# Altium PCB old(2).PcbDoc (part 1 of 4)
Units mil, origin at the board's own origin, x right, y up, seen from the top; angles counter-clockwise.
Board outline 5000 x 7000 mil, 4 copper layers (Top Layer, Signal Layer 1, Signal Layer 2, Bottom Layer), stack 61.2 mil thick; 559 components, 281 nets, 1477 pads, 685 vias.
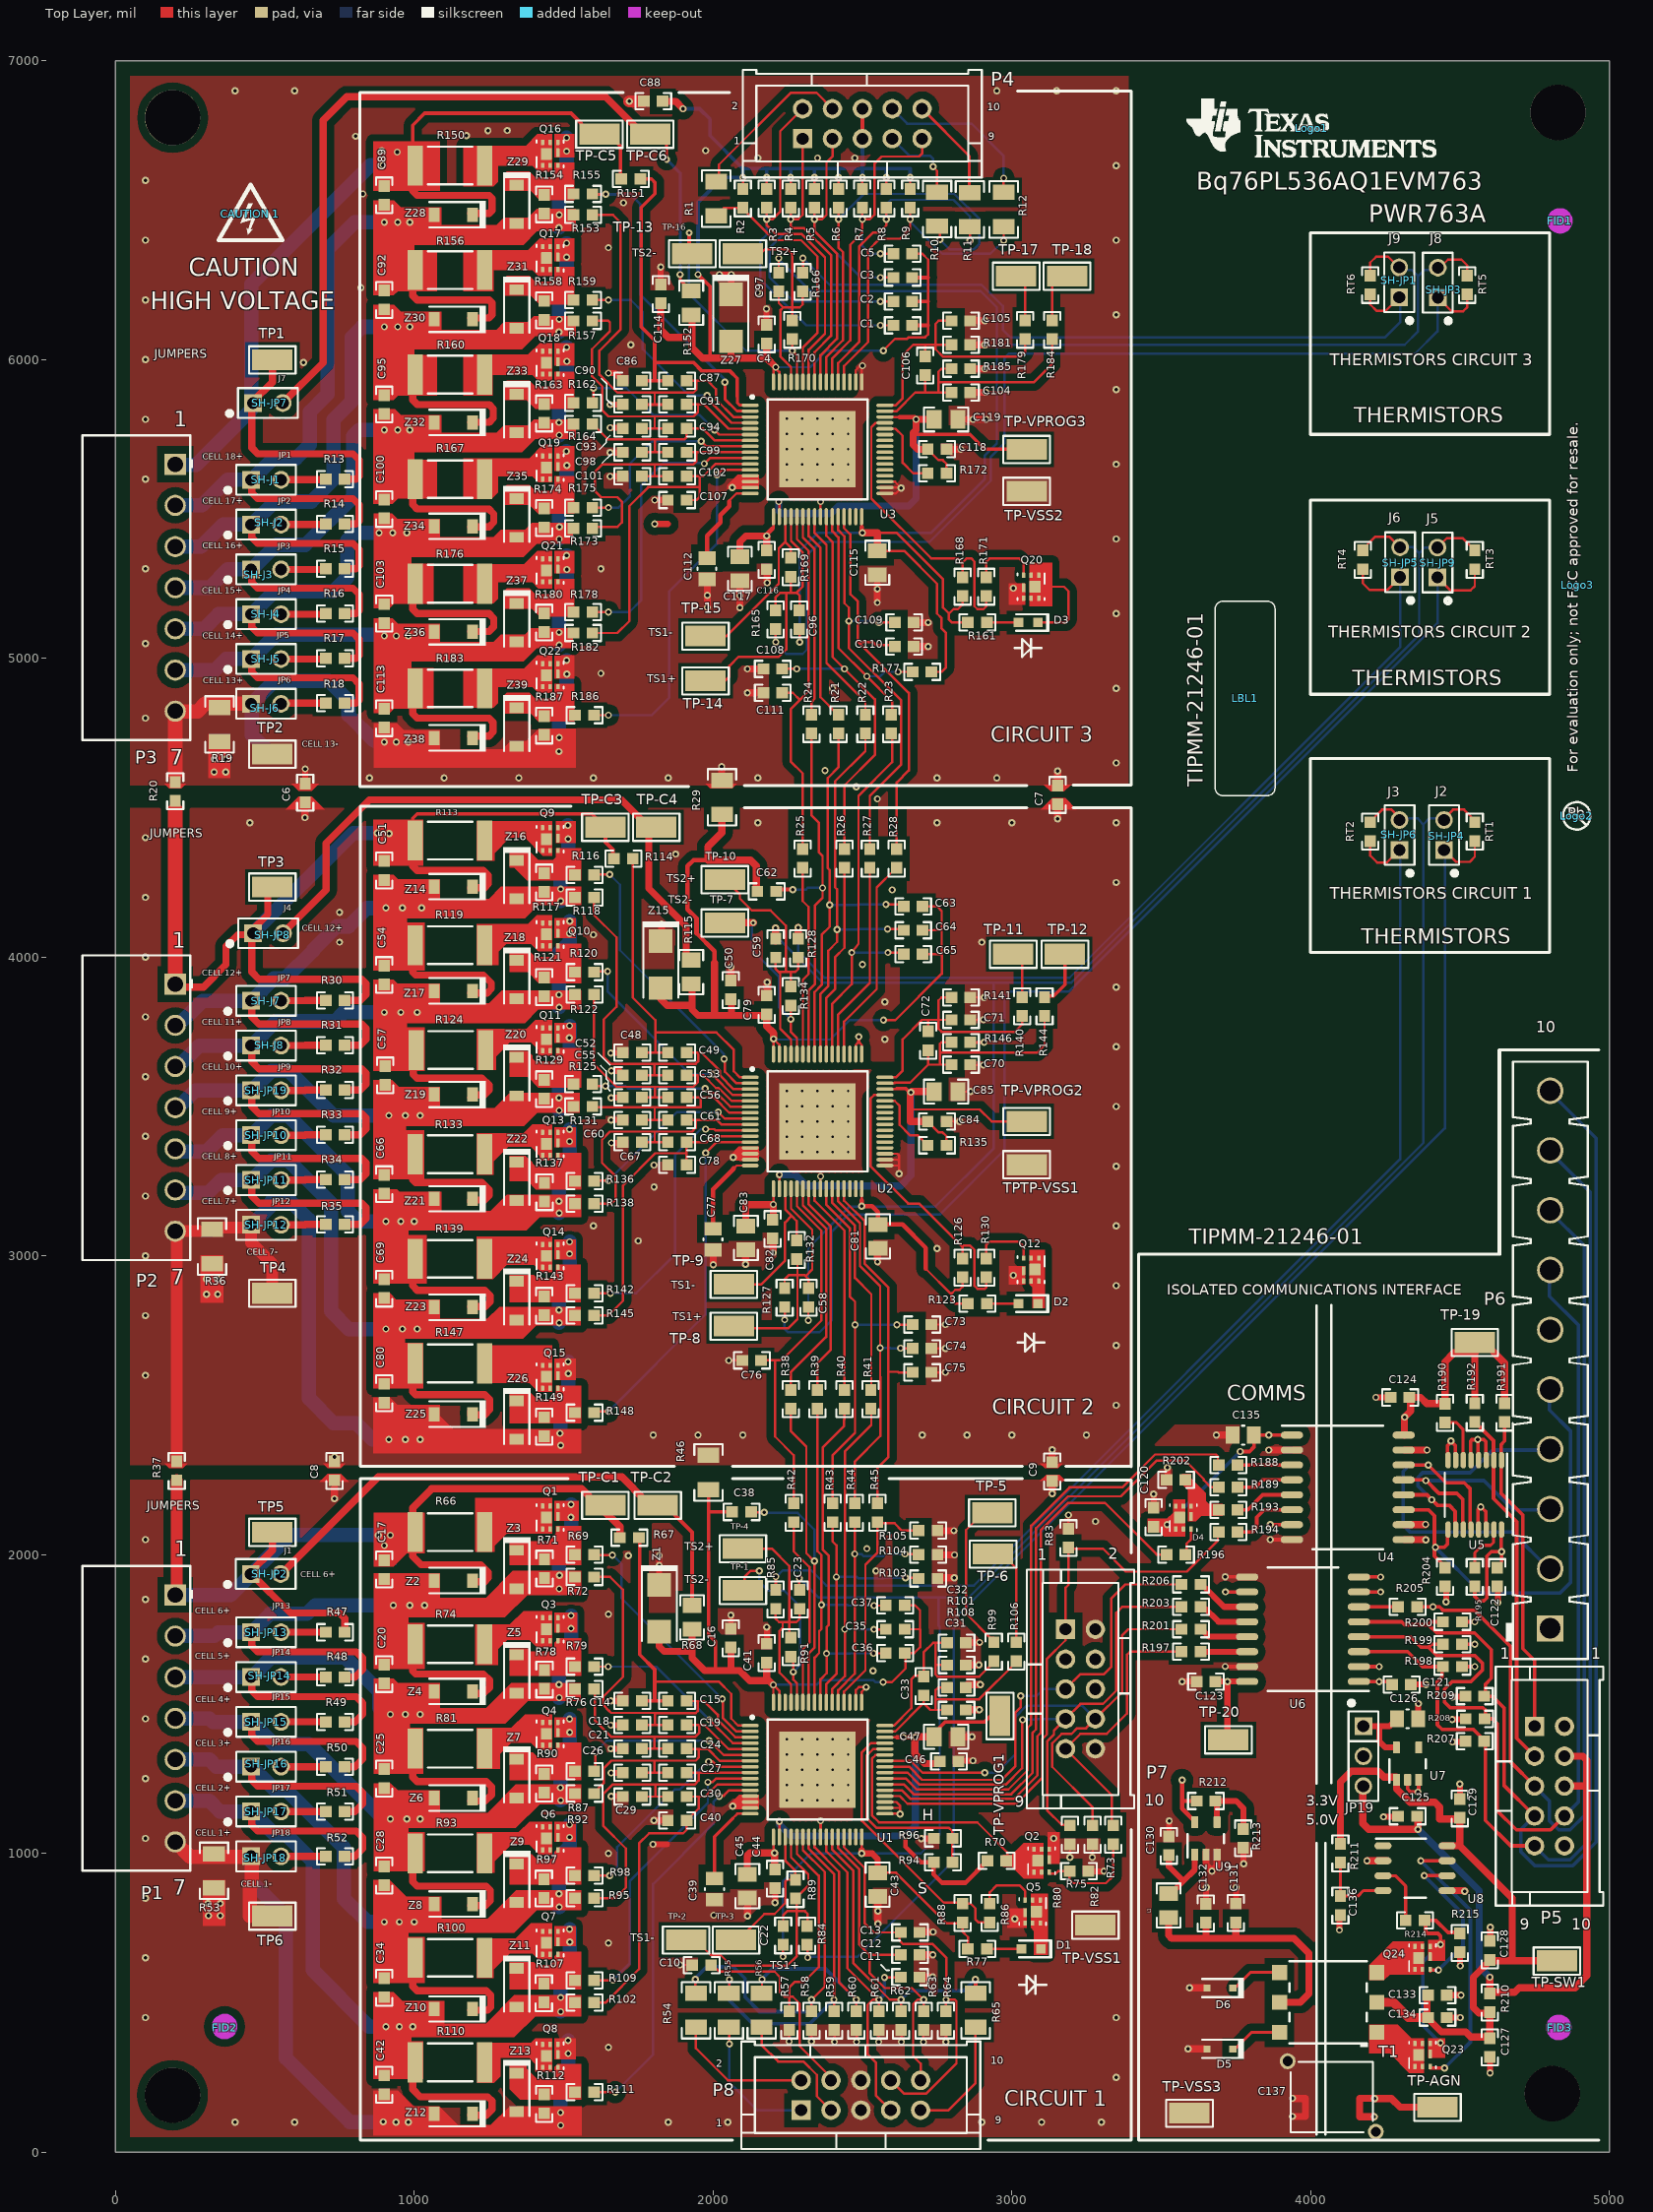
[diagram p0: Top Layer view]
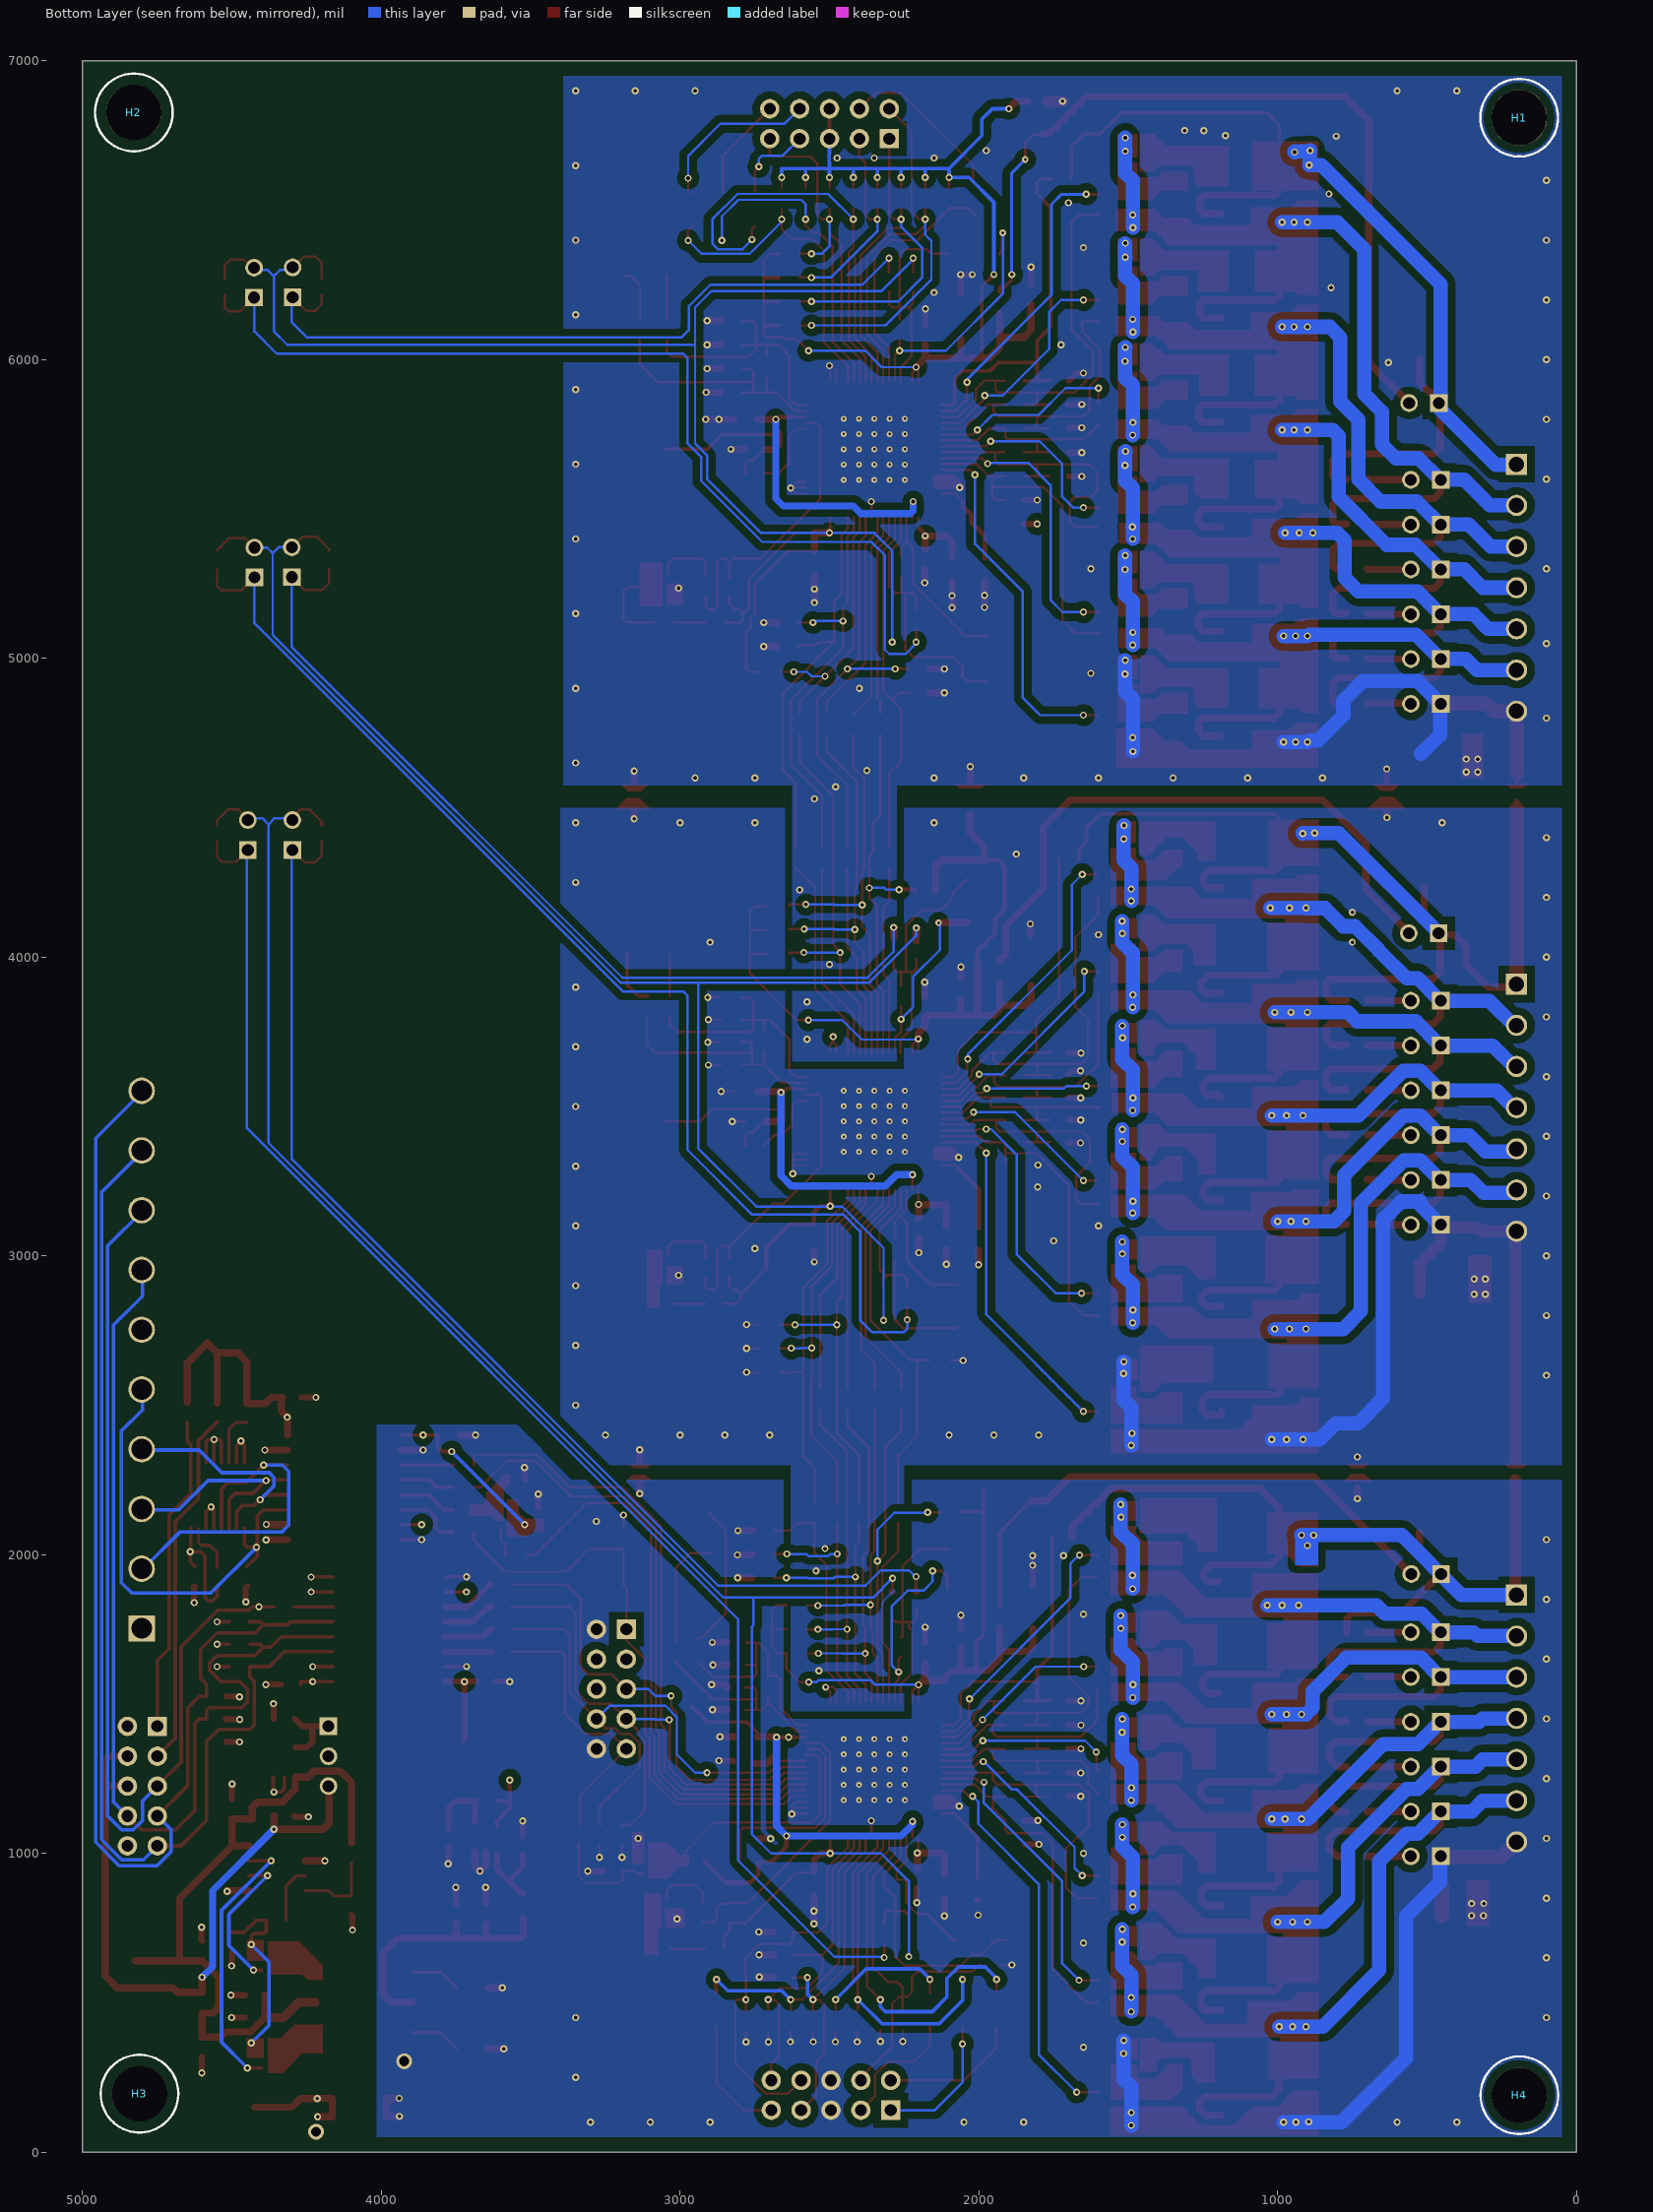
[diagram p1: Bottom Layer view, seen from below]
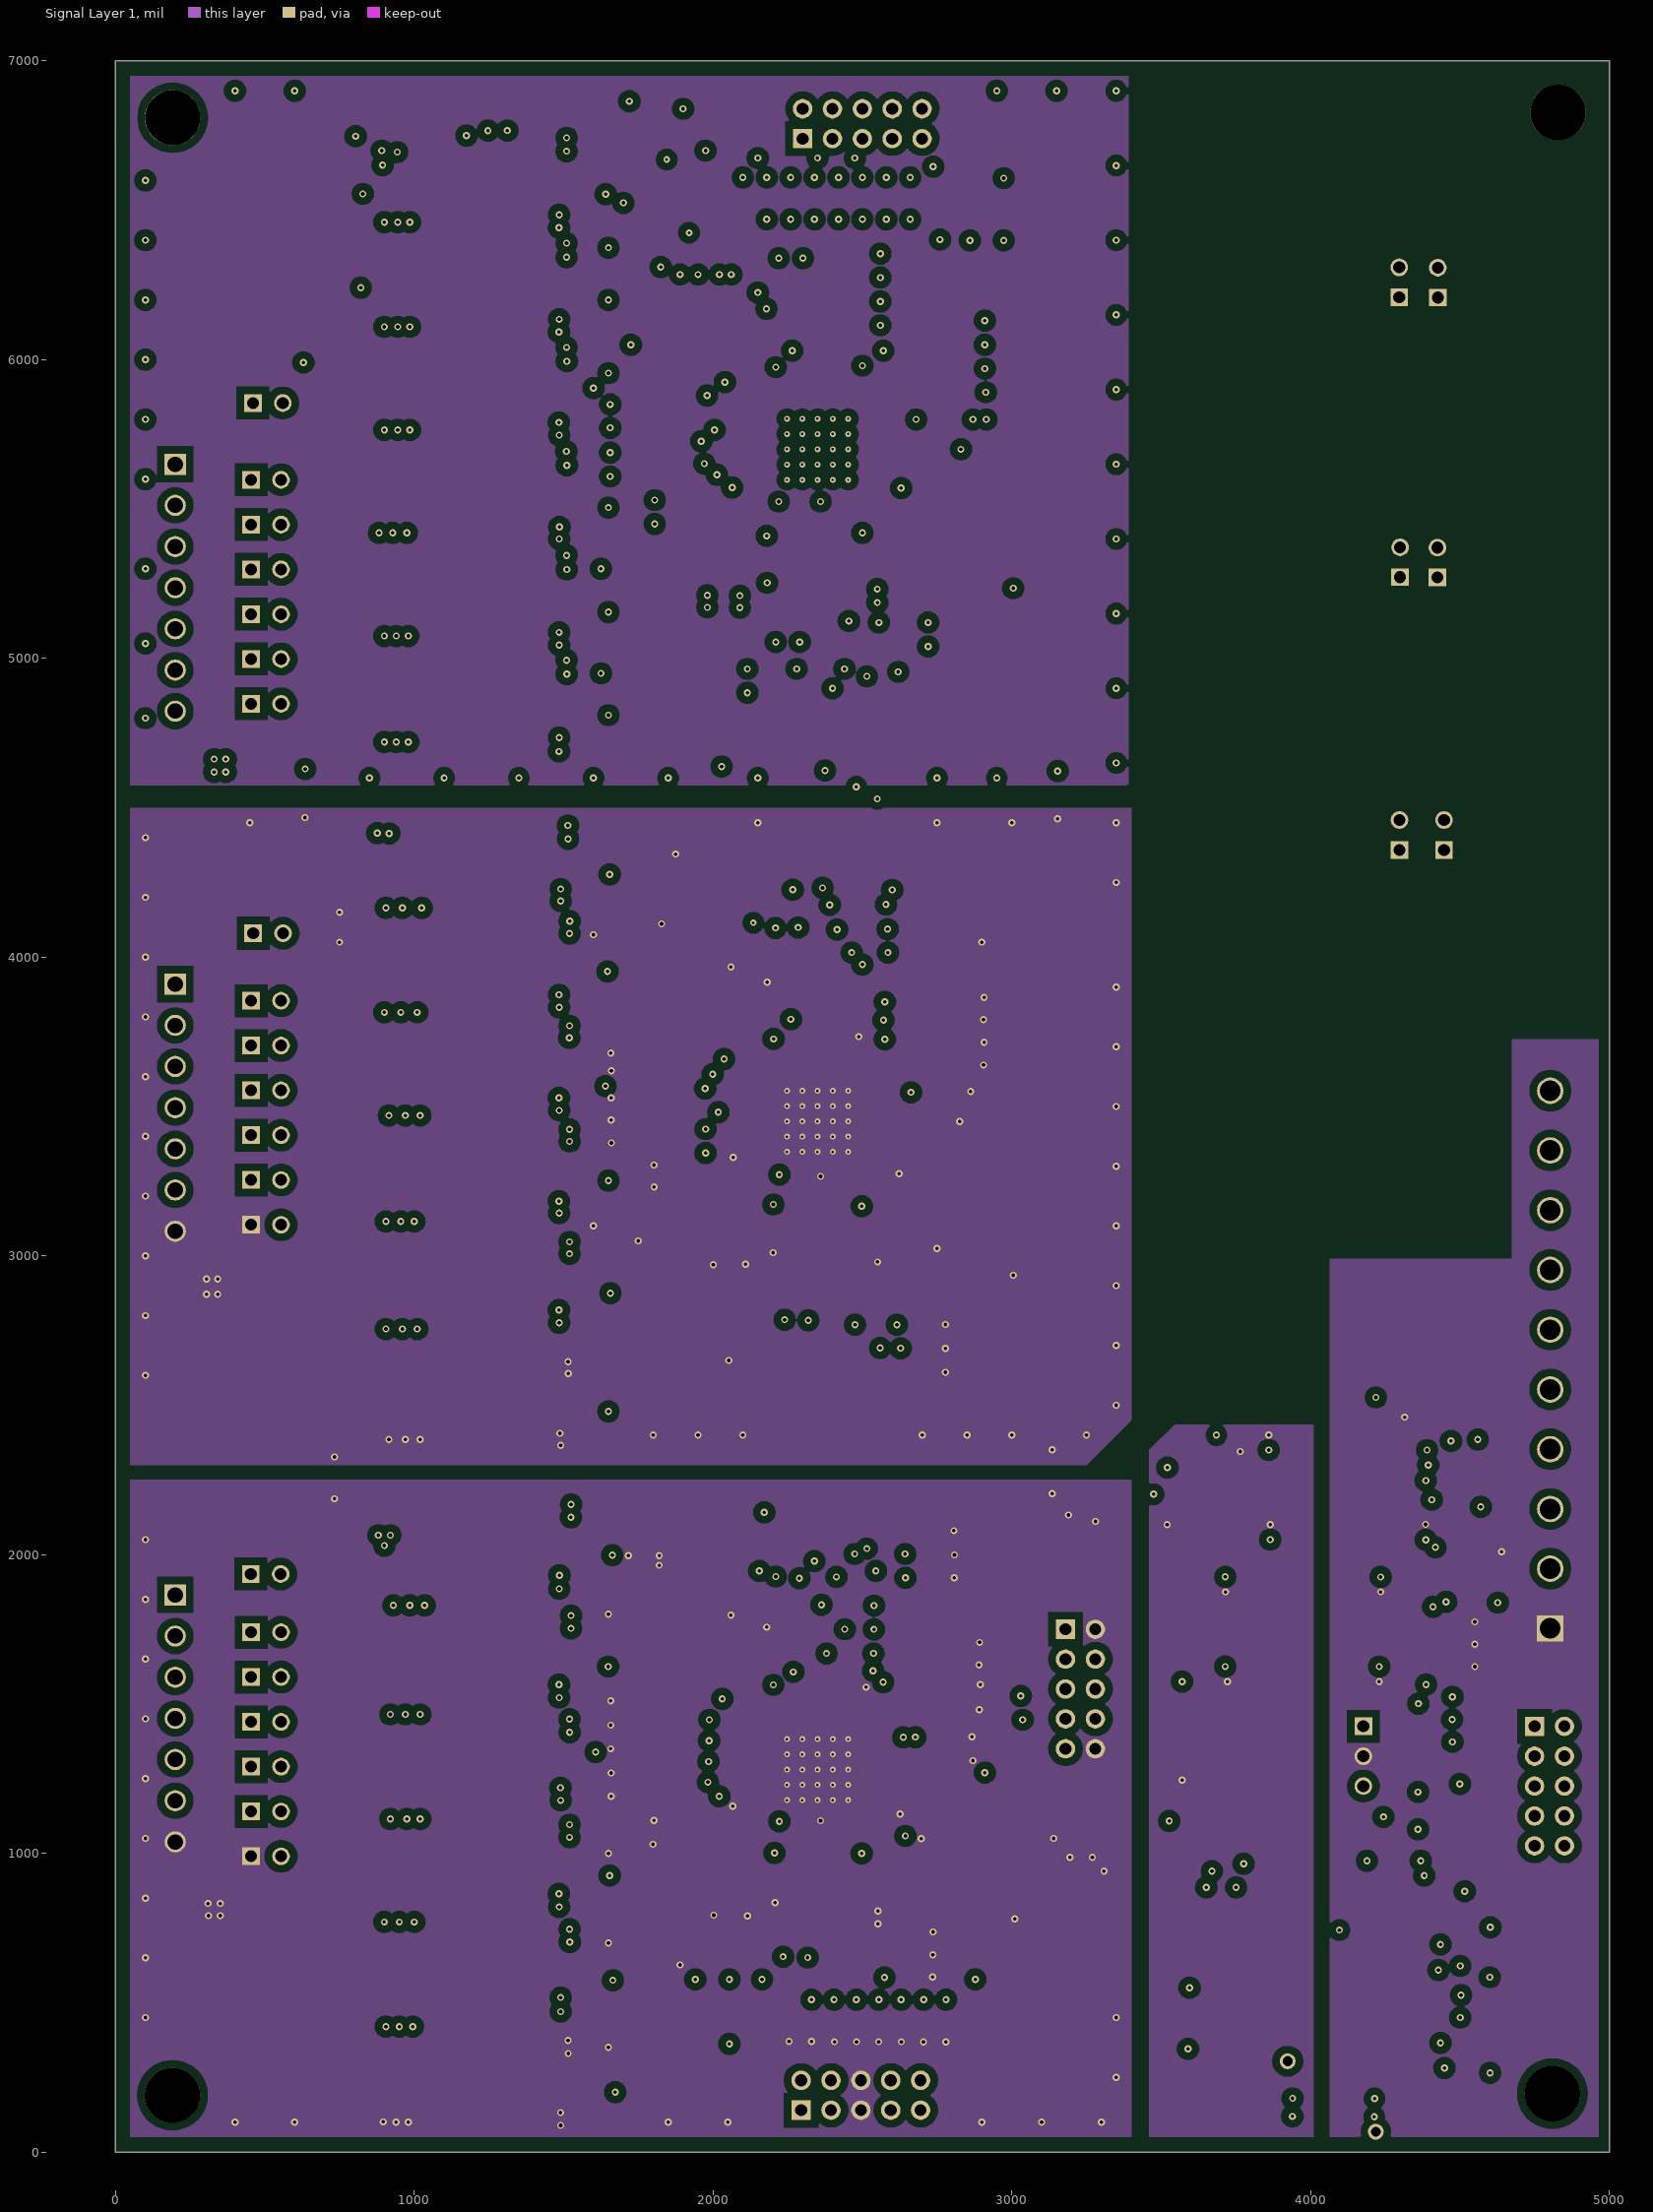
[diagram p2: Signal Layer 1]
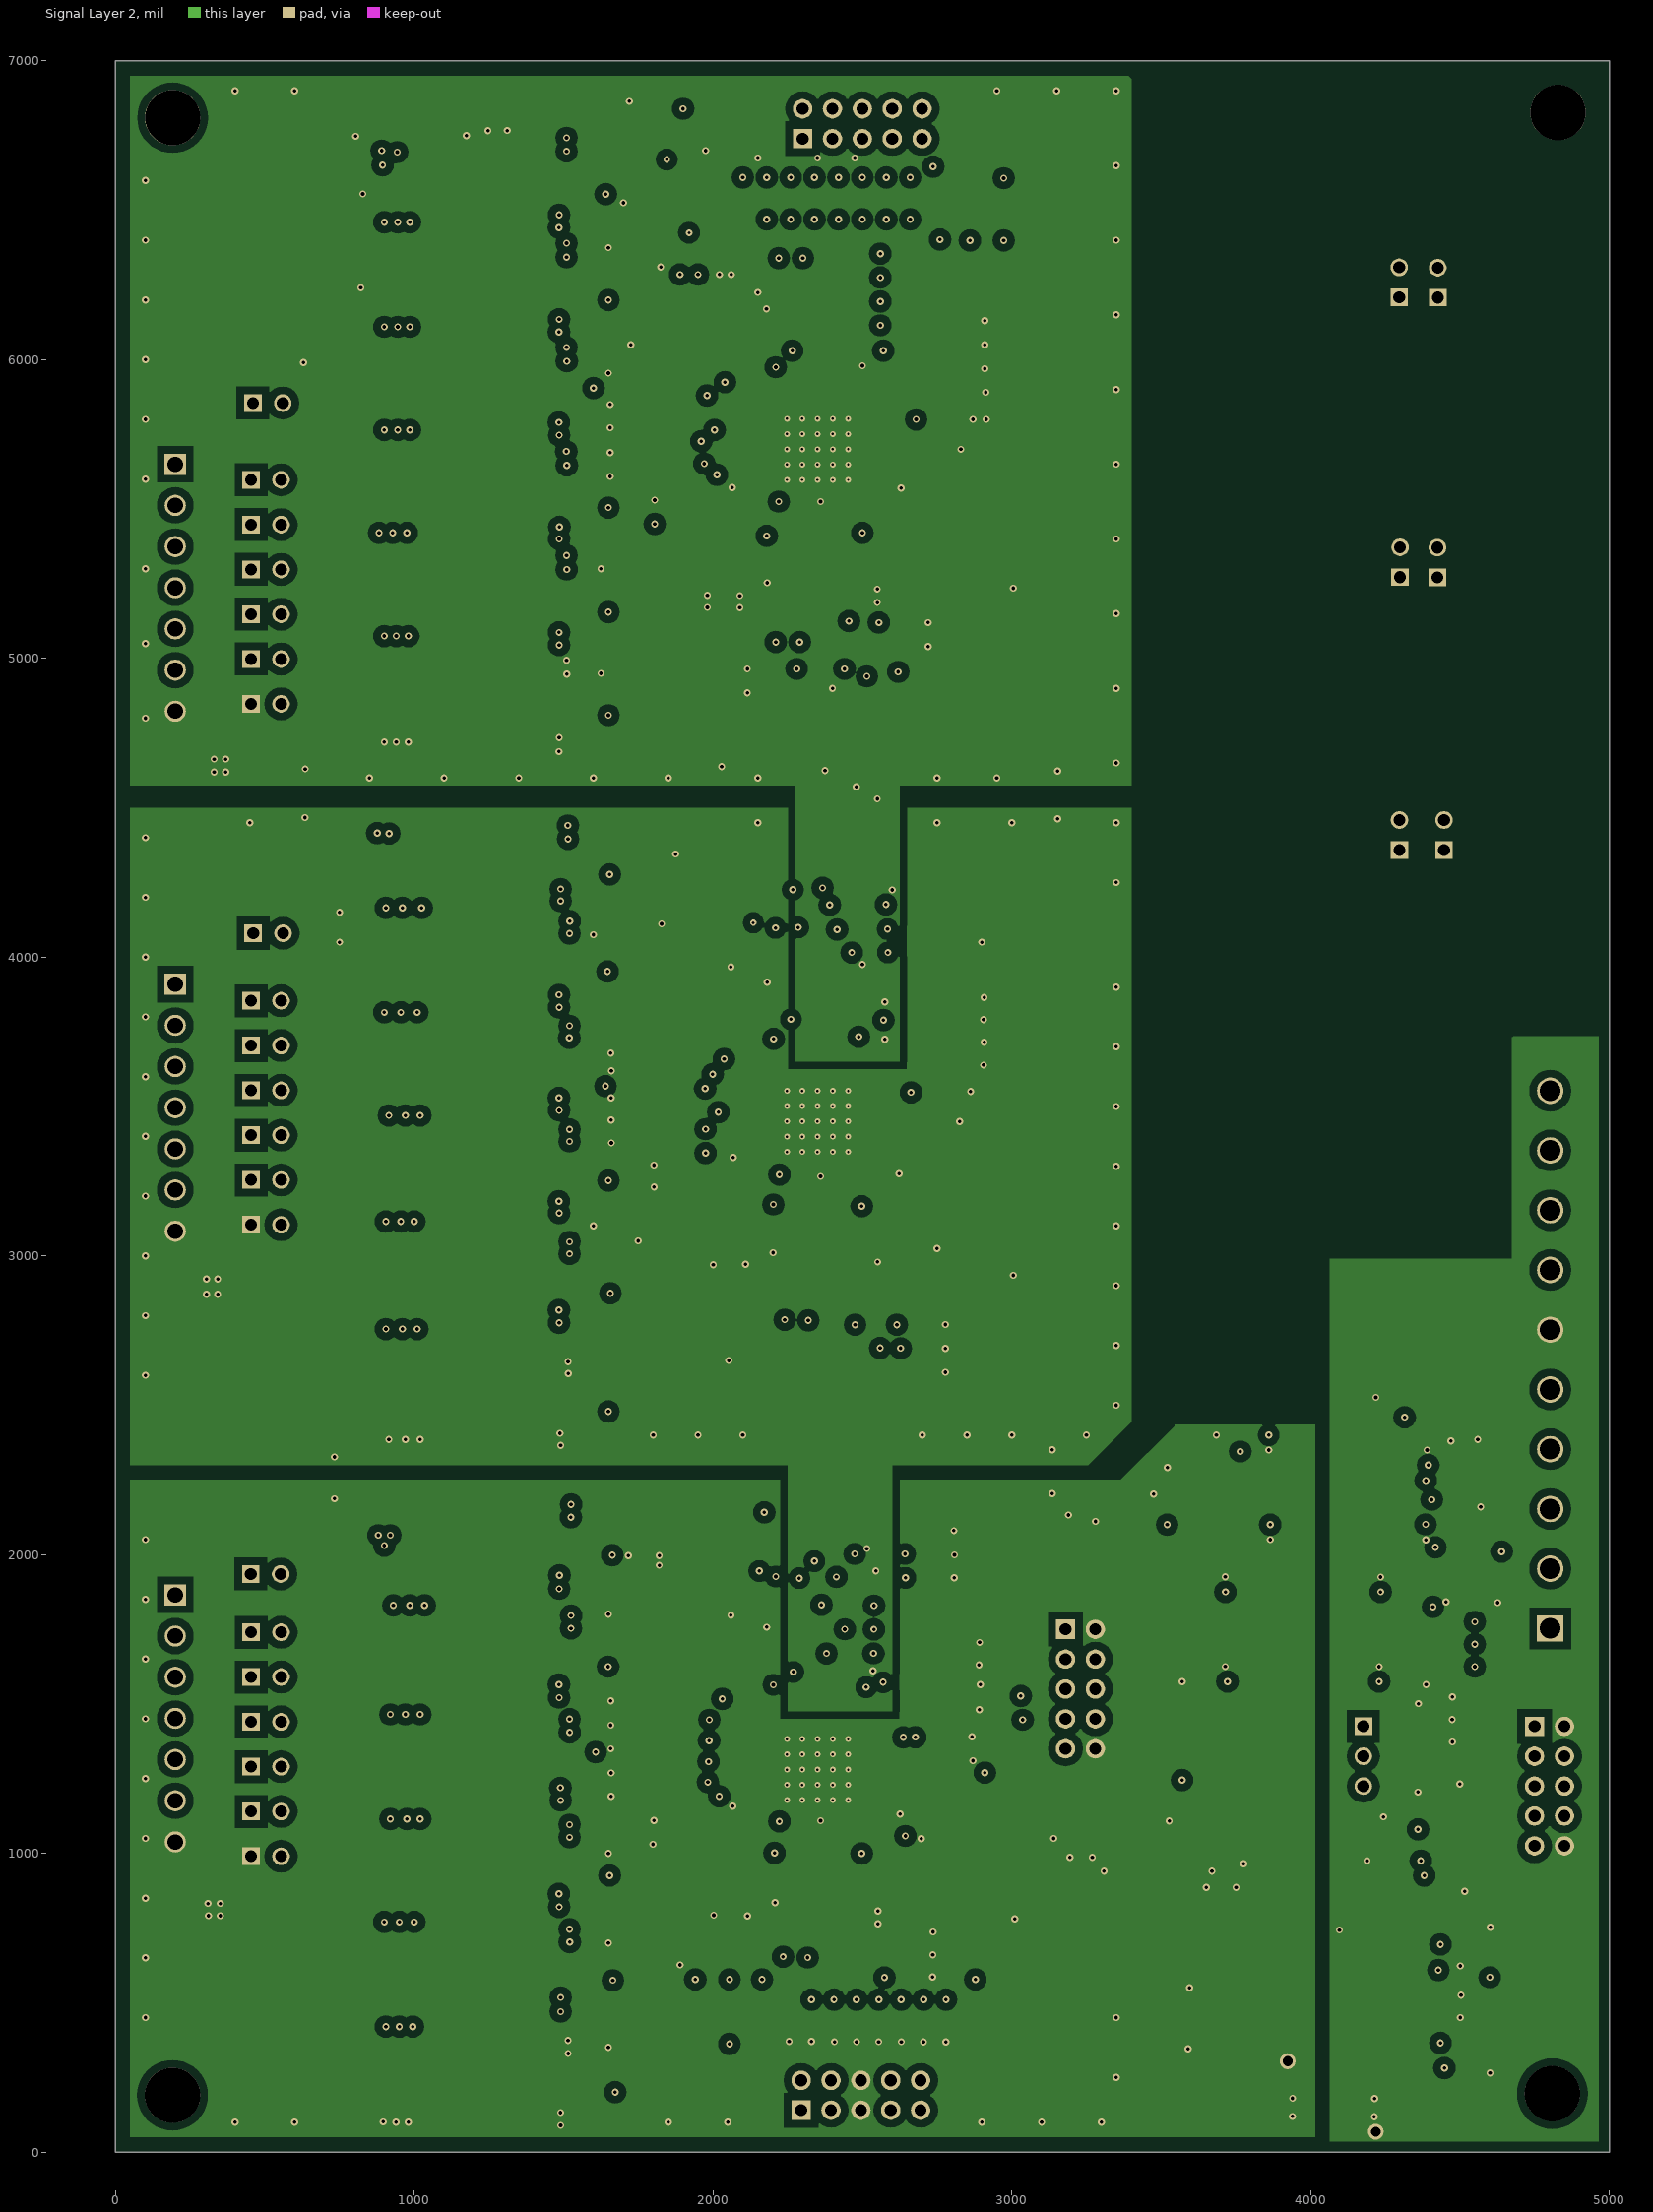
[diagram p3: Signal Layer 2]

## Layer stack, top to bottom
Top Layer: signal copper 2.8
Dielectric: core 8, FR-4 High Tg, Dk 4.8
Signal Layer 1: signal copper 2.8
Dielectric: prepreg 32, FR-4 High Tg, Dk 4.8
Signal Layer 2: signal copper 2.8
Dielectric: core 10, FR-4 High Tg, Dk 4.8
Bottom Layer: signal copper 2.8

## Board outline
0,0 5000,0 5000,7000 0,7000

## Design rules (kind name [scope] priority, off if disabled: settings)
AcuteAngle [All] p1: minimum=4.50000000000000E+0001
Clearance Clearance_D6 [InComponent('D6')] p1: gap=1
Clearance Clearance_Keepouts [((IsTrack Or IsArc) And Not InPoly) And IsFree and IsKeepOut vs ((IsTrack Or IsArc) And Not InPoly) And IsFree and IsKeepOut] p2 off: gap=0
Clearance Clearance_BoardEdge_MountingHoles [OnCopper and InComponentClass('Mounting Holes') vs IsKeepOut] p3: gap=40
Clearance Clearance_BoardEdge_Poly [OnCopper and InPoly vs IsKeepOut] p4: gap=25
Clearance Clearance_BoardEdge [OnCopper and Not InComponentClass('Logo') and not InComponentClass('FiducialMark') and not InRegion(1000,500,4000,800) and Not IsKeepout vs IsKeepOut] p5: gap=75
Clearance Clearance_Poly [InPolygon] p6: gap=25
Clearance [All] p7: gap=7.87
ComponentClearance ComponentClearance_MountingHoles_FiducialMarks [InComponentClass('Mounting Holes') vs InComponentClass('FiducialMark')] p1: gap=50 collisioncheckmode=3 verticalgap=10 showdistances=FALSE
ComponentClearance ComponentClearance_Shunt [InComponentClass('Header') vs InComponentClass('Shunt')] p2: gap=0 collisioncheckmode=3 verticalgap=0 showdistances=FALSE
ComponentClearance ComponentClearance_Logo [InComponentClass('Logo')] p3: gap=50 collisioncheckmode=3 verticalgap=10 showdistances=FALSE
ComponentClearance ComponentClearance_ScrewToNut [(HasFootprint('NY PMS 440 0025 PH')) vs (HasFootprint('Keystone_1902C'))] p4: gap=5 collisioncheckmode=3 verticalgap=10 showdistances=FALSE
ComponentClearance ComponentClearance_MountingHoles [InComponentClass('Mounting Holes')] p5: gap=250 collisioncheckmode=3 verticalgap=100000 showdistances=FALSE
ComponentClearance ComponentClearance_SmallPassives [HasFootprint('0201*') or HasFootprint('0402*') or HasFootprint('0508') or HasFootprint('0603*') or HasFootprint('0612') or HasFootprint('0805*') or HasFootprint('0815*') or HasFootprint('0830*') or HasFootprint('1206*') or HasFootprint('1210*') or HasFootprint('1808*') or HasFootprint('1812*') or HasFootprint('1825*') or HasFootprint('2010*') or HasFootprint('2220*') or HasFootprint('2225*') or HasFootprint('2512*') or HasFootprint('2728*') or HasFootprint('3518*') vs HasFootprint('0201*') or HasFootprint('0402*') or HasFootprint('0508') or HasFootprint('0603*') or HasFootprint('0612') or HasFootprint('0805*') or HasFootprint('0815*') or HasFootprint('0830*') or HasFootprint('1206*') or HasFootprint('1210*') or HasFootprint('1808*') or HasFootprint('1812*') or HasFootprint('1825*') or HasFootprint('2010*') or HasFootprint('2220*') or HasFootprint('2225*') or HasFootprint('2512*') or HasFootprint('2728*') or HasFootprint('3518*')] p6: gap=20 collisioncheckmode=3 verticalgap=10 showdistances=FALSE
ComponentClearance ComponentClearance_THtoSMT [IsThruComponent vs IsSMTComponent] p7: gap=8 collisioncheckmode=3 verticalgap=30 showdistances=FALSE
ComponentClearance ComponentClearance_THtoTH [IsThruComponent vs IsThruComponent] p8: gap=20 collisioncheckmode=3 verticalgap=30 showdistances=FALSE
ComponentClearance [All] p9: gap=20 collisioncheckmode=3 verticalgap=10 showdistances=FALSE
DiffPairsRouting [All] p1: maxlimit=100 minlimit=10 mostfreqgap=10 maxuncoupledlength=1000
FanoutControl Fanout_LCC [IsLCC] p1: bgadir=Out bgaviamode=Centered fanoutstyle=Auto fanoutdirection=Alternating viagrid=1 // Fanout_LCC (Default Rule)
FanoutControl Fanout_BGA [IsBGA] p2: bgadir=Out bgaviamode=Centered fanoutstyle=Auto fanoutdirection=Alternating viagrid=1 // Fanout_BGA (Default Rule)
FanoutControl Fanout_Default [All] p4: bgadir=Out bgaviamode=Centered fanoutstyle=Auto fanoutdirection=Alternating viagrid=1 // Fanout_Default (Default Rule)
FanoutControl Fanout_Small [(CompPinCount < 5)] p5: bgadir=Out bgaviamode=Centered fanoutstyle=Auto fanoutdirection=OutThenIn viagrid=1 // Fanout_Small (Default Rule)
HoleSize [All] p1: absolutevalues=TRUE maxlimit=251 minlimit=7.87 maxpercent=80.000 minpercent=20.000
MinimumAnnularRing MinimumAnnularRing_ThermalPadVias [IsVia and InAnyComponent] p1: minimumring=5.91
MinimumAnnularRing [All] p2: minimumring=6
MinimumSolderMaskSliver MinimumSolderMaskSliver_U6 [InComponent('D6')] p1: minsoldermaskwidth=1
MinimumSolderMaskSliver MinimumSolderMaskSliver_Logo [InComponentClass('Logo') vs InComponentClass('Logo')] p2: minsoldermaskwidth=0.7
MinimumSolderMaskSliver [All] p3: minsoldermaskwidth=3.93
PlaneConnect [All] p1: planeconnectstyle=Direct reliefexpansion=10 reliefentries=4 reliefconductorwidth=10 reliefairgap=10
PolygonConnect [All] p1: connectstyle=Direct reliefconductorwidth=10 reliefentries=4 polygonreliefangle="90 Angle"
RoutingVias ThermalPadVias [IsVia and InAnyComponent] p1: holewidth=7.87 width=19.68 viastyle="Through Hole" minholewidth=7.87 minwidth=19.68 maxholewidth=12.99 maxwidth=23.62
RoutingVias [All] p2: holewidth=16 width=34 viastyle="Through Hole" minholewidth=7.87 minwidth=22 maxholewidth=40 maxwidth=65
SilkToSilkClearance SilkToSilkClearance_Pb-FreeLogo [(HasFootprint('Pb-Free_Overlay_Medium') OR HasFootprint('Pb-Free_Overlay_Small')) vs (HasFootprint('Pb-Free_Overlay_Medium') OR HasFootprint('Pb-Free_Overlay_Small'))] p1: silktosilkclearance=0
SilkToSilkClearance [All] p2: silktosilkclearance=5
SilkscreenOverComponentPads "Silk to Solder Mask fp_1" [(HasFootprint('CAPRD750W60D700H1000') OR HasFootprint('Samtec_HPM-10-05-T-S')OR HasFootprint('Molex_395021007'))] p1: minsilkscreentomaskgap=0
SilkscreenOverComponentPads SilkToSolderMaskClearance [IsPad] p2: minsilkscreentomaskgap=3
SolderMaskExpansion [All] p1: expansion=1.97
TestPointUsage [All] p1: valid=2 allowmultiple=FALSE
Testpoint [All] p1: side=3 testpointundercomponent=TRUE minsize=40 maxsize=100 preferedsize=60 minholesize=0 maxholesize=40 preferedholesize=32 testpointgrid=1 style=297 order=0123456789
Width [All] p1: maxlimit=100 minlimit=6 preferedwidth=10 checkconnectedcopper=TRUE
13 further rules are at their usual default settings.

## Classes and differential pairs
component class Logo: Logo1
component class PWR763A_Hardware: "CAUTION 1" FID1 FID2 FID3 H1 H2 H3 H4 LBL1 Logo1 Logo2 Logo3 SH-J1 SH-J2 SH-J3 SH-J4 SH-J5 SH-J6 SH-J7 SH-J8 SH-JP1 SH-JP2 SH-JP3 SH-JP4 SH-JP5 SH-JP6 SH-JP7 SH-JP8 SH-JP9 SH-JP10 SH-JP11 SH-JP12 SH-JP13 SH-JP14 SH-JP15 SH-JP16 SH-JP17 SH-JP18 SH-JP19 ZZ1 ZZ2 ZZ3 ZZ4 ZZ5
component class FiducialMark: FID1 FID2 FID3
component class AssemblyNote: ZZ1 ZZ2 ZZ3 ZZ4 ZZ5
component class Label: LBL1
component class Header: J1 J2 J3 J4 J5 J6 J7 J8 J9 JP1 JP2 JP3 JP4 JP5 JP6 JP7 JP8 JP9 JP10 JP11 JP12 JP13 JP14 JP15 JP16 JP17 JP18 JP19 P6
component class PWR763A_1: C1 C2 C3 C4 C5 C6 C7 C8 C9 C10 C11 C12 C13 JP1 JP2 JP3 JP4 JP5 JP6 JP7 JP8 JP9 JP10 JP11 JP12 JP13 JP14 JP15 JP16 JP17 JP18 P1 P2 P3 P4 P5 P6 P7 P8 R1 R2 R3 R4 R5 R6 R7 R8 R9 R10 R11 R12 R13 R14 R15 R16 R17 R18 R19 R20 R21 R22 R23 R24 R25 R26 R27 R28 R29 R30 R31 R32 R33 R34 R35 R36 R37 R38 R39 R40 R41 R42 R43 R44 R45 R46 R47 R48 R49 R50 R51 R52 R53 R54 R55 R56 R57 R58 R59 R60 R61 R62 R63 R64 R65 TP1 TP2 TP3 TP4 TP5 TP6
component class PWR763A_2: C14 C15 C16 C17 C18 C19 C20 C21 C22 C23 C24 C25 C26 C27 C28 C29 C30 C31 C32 C33 C34 C35 C36 C37 C38 C39 C40 C41 C42 C43 C44 C45 C46 C47 D1 J1 J2 J3 Q1 Q2 Q3 Q4 Q5 Q6 Q7 Q8 R66 R67 R68 R69 R70 R71 R72 R73 R74 R75 R76 R77 R78 R79 R80 R81 R82 R83 R84 R85 R86 R87 R88 R89 R90 R91 R92 R93 R94 R95 R96 R97 R98 R99 R100 R101 R102 R103 R104 R105 R106 R107 R108 R109 R110 R111 R112 RT1 RT2 TP-1 TP-2 TP-3 TP-4 TP-5 TP-6 TP-C1 TP-C2 TP-VPROG1 TP-VSS1 U1 Z1 Z2 Z3 Z4 Z5 Z6 Z7 Z8 Z9 Z10 Z11 Z12 Z13
component class PWR763A_3: C48 C49 C50 C51 C52 C53 C54 C55 C56 C57 C58 C59 C60 C61 C62 C63 C64 C65 C66 C67 C68 C69 C70 C71 C72 C73 C74 C75 C76 C77 C78 C79 C80 C81 C82 C83 C84 C85 D2 J4 J5 J6 Q9 Q10 Q11 Q12 Q13 Q14 Q15 R113 R114 R115 R116 R117 R118 R119 R120 R121 R122 R123 R124 R125 R126 R127 R128 R129 R130 R131 R132 R133 R134 R135 R136 R137 R138 R139 R140 R141 R142 R143 R144 R145 R146 R147 R148 R149 RT3 RT4 TP-7 TP-8 TP-9 TP-10 TP-11 TP-12 TP-C3 TP-C4 TP-VPROG2 TPTP-VSS1 U2 Z14 Z15 Z16 Z17 Z18 Z19 Z20 Z21 Z22 Z23 Z24 Z25 Z26
component class PWR763A_4: C86 C87 C88 C89 C90 C91 C92 C93 C94 C95 C96 C97 C98 C99 C100 C101 C102 C103 C104 C105 C106 C107 C108 C109 C110 C111 C112 C113 C114 C115 C116 C117 C118 C119 D3 J7 J8 J9 Q16 Q17 Q18 Q19 Q20 Q21 Q22 R150 R151 R152 R153 R154 R155 R156 R157 R158 R159 R160 R161 R162 R163 R164 R165 R166 R167 R168 R169 R170 R171 R172 R173 R174 R175 R176 R177 R178 R179 R180 R181 R182 R183 R184 R185 R186 R187 RT5 RT6 TP-13 TP-14 TP-15 TP-16 TP-17 TP-18 TP-C5 TP-C6 TP-VPROG3 TP-VSS2 U3 Z27 Z28 Z29 Z30 Z31 Z32 Z33 Z34 Z35 Z36 Z37 Z38 Z39
component class PWR763A_5: C120 C121 C122 C123 C124 C125 C126 C127 C128 C129 C130 C131 C132 C133 C134 C135 C136 C137 D4 D5 D6 JP19 L1 Q23 Q24 R188 R189 R190 R191 R192 R193 R194 R195 R196 R197 R198 R199 R200 R201 R202 R203 R204 R205 R206 R207 R208 R209 R210 R211 R212 R213 R214 R215 T1 TP-19 TP-20 TP-AGN TP-SW1 TP-VSS3 U4 U5 U6 U7 U8 U9
component class Shunt: SH-J1 SH-J2 SH-J3 SH-J4 SH-J5 SH-J6 SH-J7 SH-J8 SH-JP1 SH-JP2 SH-JP3 SH-JP4 SH-JP5 SH-JP6 SH-JP7 SH-JP8 SH-JP9 SH-JP10 SH-JP11 SH-JP12 SH-JP13 SH-JP14 SH-JP15 SH-JP16 SH-JP17 SH-JP18 SH-JP19

## Components (designator, comment, footprint, x,y, rotation, side; value= is the part's Value field where it differs from the comment)
C1 "06035C104KAT2A" 0603#1 2635,6115 r180 top
C2 "06035C104KAT2A" 0603#1 2635,6195 r180 top
C3 "06035C104KAT2A" 0603#1 2635,6275 r180 top
C4 "06035C104KAT2A" 0603#1 2180,6085 r90 top
C5 "06035C104KAT2A" 0603#1 2635,6355 r180 top
C6 "GRM188R71H332KA01D" 0603#1 635,4550 r90 top
C7 "GRM188R71H332KA01D" 0603#1 3154,4543 r270 top
C8 "GRM188R71H332KA01D" 0603#1 733,2280 r90 top
C9 "GRM188R71H332KA01D" 0603#1 3135,2278 r270 top
C10 "06035C104KAT2A" 0603#1 1962,626 r180 top
C11 "06035C104KAT2A" 0603#1 2660,585 r0 top
C12 "06035C104KAT2A" 0603#1 2660,660 r0 top
C13 "06035C104KAT2A" 0603#1 2660,735 r0 top
C14 "06035C104KAT2A" 0603#1 1730,1510 r180 top
C15 "GRM188R72A104KA35D" 0603#1 1880,1510 r0 top
C16 "GRM188R72A104KA35D" 0603#1 2060,1720 r90 top
C17 "06035C104KAT2A" 0603#1 900,1950 r270 top
C18 "06035C104KAT2A" 0603#1 1730,1430 r180 top
C19 "GRM188R72A104KA35D" 0603#1 1880,1430 r0 top
C20 "06035C104KAT2A" 0603#1 900,1600 r270 top
C21 "06035C104KAT2A" 0603#1 1730,1350 r180 top
C22 "GRM188R71C473KA01D" 0603#1 2235,725 r90 top
C23 "GRM188R71C473KA01D" 0603#1 2290,1850 r270 top
C24 "GRM188R72A104KA35D" 0603#1 1880,1350 r0 top
C25 "06035C104KAT2A" 0603#1 900,1250 r270 top
C26 "06035C104KAT2A" 0603#1 1730,1270 r180 top
C27 "GRM188R72A104KA35D" 0603#1 1880,1270 r0 top
C28 "06035C104KAT2A" 0603#1 900,925 r270 top
C29 "06035C104KAT2A" 0603#1 1730,1190 r180 top
C30 "GRM188R72A104KA35D" 0603#1 1880,1190 r0 top
C31 "C0603C104K4RACTU" 0603#1 2815,1480 r0 top
C32 "C0603C104K4RACTU" 0603#1 2815,1705 r0 top
C33 "C0603C104K4RACTU" 0603#1 2705,1560 r270 top
C34 "GRM188R72A104KA35D" 0603#1 900,550 r270 top
C35 "GRM1885C1H330JA01D" 0603#1 2610,1750 r0 top
C36 "GRM1885C1H330JA01D" 0603#1 2610,1670 r0 top
C37 "GRM1885C1H330JA01D" 0603#1 2610,1830 r0 top
C38 "GRM1885C1H330JA01D" 0603#1 2095.67,2142.55 r180 top
C39 "C2012X7R1A106M125AC" 0805_145 2005,880 r270 top
C40 "06035C104KAT2A" 0603#1 1880,1110 r180 top
C41 "06035C104KAT2A" 0603#1 2180,1670 r90 top
C42 "06035C104KAT2A" 0603#1 900,225 r270 top
C43 "GRM21BR71A225KA01L" 0805_HV 2551,895 r270 top
C44 "06035C104KAT2A" 0603#1 2208,915 r270 top
C45 "GRM21BR71A225KA01L" 0805_HV 2115,890 r270 top
C46 "06035C104KAT2A" 0603#1 2790,1308 r0 top
C47 "GRM21BR71A225KA01L" 0805_HV 2780,1390 r0 top
C48 "06035C104KAT2A" 0603#1 1730,3680 r180 top
C49 "GRM188R72A104KA35D" 0603#1 1880,3680 r0 top
C50 "GRM188R72A104KA35D" 0603#1 2060,3890 r90 top
C51 "06035C104KAT2A" 0603#1 900,4290 r270 top
C52 "06035C104KAT2A" 0603#1 1730,3605 r180 top
C53 "GRM188R72A104KA35D" 0603#1 1880,3605 r0 top
C54 "06035C104KAT2A" 0603#1 900,3940 r270 top
C55 "06035C104KAT2A" 0603#1 1730,3530 r180 top
C56 "GRM188R72A104KA35D" 0603#1 1880,3530 r0 top
C57 "06035C104KAT2A" 0603#2 711,3524 r270 top
C58 "GRM188R71C473KA01D" 0603#1 2320,2860 r90 top
C59 "GRM188R71C473KA01D" 0603#1 2210,4030 r270 top
C60 "06035C104KAT2A" 0603#1 1730,3455 r180 top
C61 "GRM188R72A104KA35D" 0603#1 1880,3455 r0 top
C62 "GRM1885C1H330JA01D" 0603#1 2180,4220 r0 top
C63 "GRM1885C1H330JA01D" 0603#1 2670,4170 r180 top
C64 "GRM1885C1H330JA01D" 0603#1 2670,4090 r180 top
C65 "GRM1885C1H330JA01D" 0603#1 2670,4010 r180 top
C66 "06035C104KAT2A" 0603#1 900,3240 r270 top
C67 "06035C104KAT2A" 0603#1 1730,3380 r180 top
C68 "GRM188R72A104KA35D" 0603#1 1880,3380 r0 top
C69 "GRM188R72A104KA35D" 0603#1 900,2890 r270 top
C70 "C0603C104K4RACTU" 0603#1 2830,3640 r0 top
C71 "C0603C104K4RACTU" 0603#1 2830,3790 r0 top
C72 "C0603C104K4RACTU" 0603#1 2720,3720 r270 top
C73 "GRM1885C1H330JA01D" 0603#1 2700,2770 r0 top
C74 "GRM1885C1H330JA01D" 0603#1 2700,2690 r0 top
C75 "GRM1885C1H330JA01D" 0603#1 2700,2610 r0 top
C76 "GRM1885C1H330JA01D" 0603#1 2130,2650 r180 top
C77 "C2012X7R1A106M125AC" 0805_145 2000,3055 r270 top
C78 "06035C104KAT2A" 0603#1 1880,3305 r180 top
C79 "06035C104KAT2A" 0603#1 2180,3840 r90 top
C80 "06035C104KAT2A" 0603#1 900,2540 r270 top
C81 "GRM21BR71A225KA01L" 0805_HV 2552,3065 r270 top
C82 "06035C104KAT2A" 0603#1 2200,3090 r270 top
C83 "GRM21BR71A225KA01L" 0805_HV 2110,3060 r270 top
C84 "06035C104KAT2A" 0603#1 2750,3450 r0 top
C85 "GRM21BR71A225KA01L" 0805_HV 2780,3550 r0 top
C86 "06035C104KAT2A" 0603#1 1730,5930 r180 top
C87 "GRM188R72A104KA35D" 0603#1 1880,5930 r0 top
C88 "GRM188R72A104KA35D" 0603#1 1800,6865 r180 top
C89 "06035C104KAT2A" 0603#1 900,6550 r270 top
C90 "06035C104KAT2A" 0603#1 1730,5850 r180 top
C91 "GRM188R72A104KA35D" 0603#1 1880,5850 r0 top
C92 "06035C104KAT2A" 0603#1 900,6200 r270 top
C93 "06035C104KAT2A" 0603#1 1730,5770 r180 top
C94 "GRM188R72A104KA35D" 0603#1 1880,5770 r0 top
C95 "06035C104KAT2A" 0603#1 900,5850 r270 top
C96 "GRM188R71C473KA01D" 0603#1 2289,5130 r90 top
C97 "GRM188R71C473KA01D" 0603#1 2220,6260 r270 top
C98 "06035C104KAT2A" 0603#1 1730,5690 r180 top
C99 "GRM188R72A104KA35D" 0603#1 1880,5690 r0 top
C100 "06035C104KAT2A" 0603#1 900,5500 r270 top
C101 "06035C104KAT2A" 0603#1 1730,5610 r180 top
C102 "GRM188R72A104KA35D" 0603#1 1880,5610 r0 top
C103 "GRM188R72A104KA35D" 0603#1 900,5150 r270 top
C104 "C0603C104K4RACTU" 0603#1 2830,5890 r0 top
C105 "C0603C104K4RACTU" 0603#1 2830,6130 r0 top
C106 "C0603C104K4RACTU" 0603#1 2710,5980 r270 top
C107 "06035C104KAT2A" 0603#1 1880,5530 r180 top
C108 "GRM1885C1H330JA01D" 0603#1 2200,4965 r180 top
C109 "GRM1885C1H330JA01D" 0603#1 2640,5120 r0 top
C110 "GRM1885C1H330JA01D" 0603#1 2640,5040 r0 top
C111 "GRM1885C1H330JA01D" 0603#1 2200,4885 r180 top
C112 "C2012X7R1A106M125AC" 0805_145 1980,5300 r270 top
C113 "06035C104KAT2A" 0603#1 900,4800 r270 top
C114 "06035C104KAT2A" 0603#1 1825,6220 r90 top
C115 "GRM21BR71A225KA01L" 0805_HV 2550,5320 r270 top
C116 "06035C104KAT2A" 0603#1 2180,5330 r270 top
C117 "GRM21BR71A225KA01L" 0805_HV 2090,5300 r270 top
C118 "06035C104KAT2A" 0603#1 2750,5700 r0 top
C119 "GRM21BR71A225KA01L" 0805_HV 2780,5800 r0 top
C120 "06035C104KAT2A" 0603#1 3475,2125 r90 top
C121 "06035C104KAT2A" 0603#1 4305,1565 r0 top
C122 "06035C104KAT2A" 0603#1 4625,1925 r270 top
C123 "06035C104KAT2A" 0603#1 3650,1575 r180 top
C124 "06035C104KAT2A" 0603#1 4300,2526 r180 top
C125 "06035C104KAT2A" 0603#1 4325,1124 r180 top
C126 "C2012X7R1A106M125AC" 0805_145 4325,1450 r0 top
C127 "C1608X7R1C105K" 0603#1 4600,350 r270 top
C128 "C0603C475K8PACTU" 0603#1 4600,675 r90 top
C129 "06035C104KAT2A" 0603#1 4500,1150 r90 top
C130 "C0603C475K8PACTU" 0603#1 3526,1025 r90 top
C131 "C0603C475K8PACTU" 0603#1 3750,800 r90 top
C132 "06035C104KAT2A" 0603#1 3650,799 r90 top
C133 "06035C104KAT2A" 0603#1 4425,525 r0 top
C134 "C0603C475K8PACTU" 0603#1 4425,450 r0 top
C135 "C2012X7R1A106M125AC" 0805_145 3775,2400 r180 top
C136 "C0603C151J5GACTU" 0603#1 4100,825 r270 top
C137 "DEBE33F102ZC3B" CAPRD750W60D700H1000 4071,186 r180 top locked
"CAUTION 1" "DANGER HIGH VOLTAGE" IEC_HighVoltage_Small 452,6488 r0 top
D1 "APT1608SYCK" APT1608_Yellow 3065,680 r0 top
D2 "APT1608SYCK" APT1608_Yellow 3055,2840 r0 top
D3 "APT1608SYCK" APT1608_Yellow 3055,5120 r0 top
D4 "CSD25310Q2" TRANS_NexFET_Q2 3574.53,2123.54 r90 top
D5 "BAT54HT1G" sod-323 3697,345 r180 top
D6 "BAT54HT1G" sod-323 3697,549 r180 top
FID1 "Fiducial" Fiducial10-20#1 4835,6465 r0 top
FID2 "Fiducial" Fiducial10-20#2 365,420 r0 top
FID3 "Fiducial" Fiducial10-20#3 4831,417 r0 top
H1 "9030" Keystone_9030 191.29,6810.08 r180 bottom locked
H2 "9030" Keystone_9030 4828.51,6827.7 r180 bottom
H3 "9030" Keystone_9030 4809.63,195.37 r180 bottom
H4 "9030" Keystone_9030 190.84,190.04 r180 bottom locked
J1 "PEC02SAAN" CONN_PEC02SAAN 503,1935 r0 top
J2 "PEC02SAAN" CONN_PEC02SAAN 4447,4409 r90 top
J3 "PEC02SAAN" CONN_PEC02SAAN 4298,4409 r90 top
J4 "PEC02SAAN" CONN_PEC02SAAN 511,4080 r0 top
J5 "PEC02SAAN" CONN_PEC02SAAN 4425,5321 r90 top
J6 "PEC02SAAN" CONN_PEC02SAAN 4300,5322 r90 top
J7 "PEC02SAAN" CONN_PEC02SAAN 510,5855 r0 top
J8 "PEC02SAAN" CONN_PEC02SAAN 4426,6258 r90 top
J9 "PEC02SAAN" CONN_PEC02SAAN 4297,6259 r90 top
JP1 "PEC02SAAN" CONN_PEC02SAAN 504,5598 r0 top
JP2 "PEC02SAAN" CONN_PEC02SAAN 504,5448 r0 top
JP3 "PEC02SAAN" CONN_PEC02SAAN 504,5298 r0 top
JP4 "PEC02SAAN" CONN_PEC02SAAN 504,5148 r0 top
JP5 "PEC02SAAN" CONN_PEC02SAAN 504,4998 r0 top
JP6 "PEC02SAAN" CONN_PEC02SAAN 504,4848 r0 top
JP7 "PEC02SAAN" CONN_PEC02SAAN 504,3854 r0 top
JP8 "PEC02SAAN" CONN_PEC02SAAN 504,3704 r0 top
JP9 "PEC02SAAN" CONN_PEC02SAAN 504,3554 r0 top
JP10 "PEC02SAAN" CONN_PEC02SAAN 504,3404 r0 top
JP11 "PEC02SAAN" CONN_PEC02SAAN 504,3254 r0 top
JP12 "PEC02SAAN" CONN_PEC02SAAN 504,3104 r0 top
JP13 "PEC02SAAN" CONN_PEC02SAAN 504,1740 r0 top
JP14 "PEC02SAAN" CONN_PEC02SAAN 504,1590 r0 top
JP15 "PEC02SAAN" CONN_PEC02SAAN 504,1440 r0 top
JP16 "PEC02SAAN" CONN_PEC02SAAN 504,1290 r0 top
JP17 "PEC02SAAN" CONN_PEC02SAAN 504,1140 r0 top
JP18 "PEC02SAAN" CONN_PEC02SAAN 504,990 r0 top
JP19 "PEC03SAAN" CONN_PEC03SAAN 4177,1325 r270 top
L1 "LB2012T100KR" 0805_HV 3525,825 r90 top
LBL1 "Size: 0.65\" x 0.20 \"" Label_650x200 3781.16,4866.06 r90 top
Logo1 "Texas Instruments" TI_Stacked_Overlay_Small 4003,6775 r0 top
Logo2 "Pb-Free Symbol" Pb-Free_Overlay_Small 4891,4473 r0 top
Logo3 "FCC disclaimer" FCC_disclaimer 4893,5245 r90 top
P1 "395021007" Molex_395021007 200,1451.61 r270 top locked
P2 "395021007" Molex_395021007 200,3496 r270 top locked
P3 "395021007" Molex_395021007 200,5236.61 r270 top locked
P4 "5103308-1" CONN_5103308-1 2500,6790 r0 top locked
P5 "5103308-1" CONN_5103308-1 4800,1225 r270 top locked
P6 "HPM-10-05-T-S" Samtec_HPM-10-05-T-S 4802.59,2652.75 r90 top
P7 "5103308-1" CONN_5103308-1 3230,1550 r270 top locked
P8 "5103308-1" CONN_5103308-1 2495,190 r0 top locked
Q1 "CSD16301Q2" TRANS_NexFET_Q2 1455,2124 r90 top
Q2 "CSD16301Q2" TRANS_NexFET_Q2 3100,975 r90 top
Q3 "CSD16301Q2" TRANS_NexFET_Q2 1455,1750 r90 top
Q4 "CSD16301Q2" TRANS_NexFET_Q2 1455,1400 r90 top
Q5 "CSD16301Q2" TRANS_NexFET_Q2 3070,805 r270 top
Q6 "CSD16301Q2" TRANS_NexFET_Q2 1455,1050 r90 top
Q7 "CSD16301Q2" TRANS_NexFET_Q2 1455,700 r90 top
Q8 "CSD16301Q2" TRANS_NexFET_Q2 1455,322 r90 top
Q9 "CSD16301Q2" TRANS_NexFET_Q2 1455,4395 r90 top
Q10 "CSD16301Q2" TRANS_NexFET_Q2 1455,4076 r90 top
Q11 "CSD16301Q2" TRANS_NexFET_Q2 1455,3725 r90 top
Q12 "CSD16301Q2" TRANS_NexFET_Q2 3065,2954 r270 top
Q13 "CSD16301Q2" TRANS_NexFET_Q2 1455,3375 r90 top
Q14 "CSD16301Q2" TRANS_NexFET_Q2 1455,3000 r90 top
Q15 "CSD16301Q2" TRANS_NexFET_Q2 1455,2595 r90 top
Q16 "CSD16301Q2" TRANS_NexFET_Q2 1455,6689 r90 top
Q17 "CSD16301Q2" TRANS_NexFET_Q2 1455,6340 r90 top
Q18 "CSD16301Q2" TRANS_NexFET_Q2 1455,5990 r90 top
Q19 "CSD16301Q2" TRANS_NexFET_Q2 1455,5639 r90 top
Q20 "CSD16301Q2" TRANS_NexFET_Q2 3065,5240 r270 top
Q21 "CSD16301Q2" TRANS_NexFET_Q2 1455,5295 r90 top
Q22 "CSD16301Q2" TRANS_NexFET_Q2 1455,4944 r90 top
Q23 "CSD16301Q2" TRANS_NexFET_Q2 4375,325 r90 top
Q24 "CSD16301Q2" TRANS_NexFET_Q2 4375,650 r90 top
R1 "CRCW12061K00FKEA" 1206 2011,6539 r90 top
R2 "CRCW06030000Z0EA" 0603#1 2100,6540 r90 top
R3 "CRCW06030000Z0EA" 0603#1 2180,6540 r90 top
R4 "CRCW06030000Z0EA" 0603#1 2260,6540 r90 top
R5 "CRCW06030000Z0EA" 0603#1 2340,6540 r90 top
R6 "CRCW06030000Z0EA" 0603#1 2420,6540 r90 top
R7 "CRCW06030000Z0EA" 0603#1 2500,6540 r90 top
R8 "CRCW06030000Z0EA" 0603#1 2580,6540 r90 top
R9 "CRCW06030000Z0EA" 0603#1 2660,6540 r90 top
R10 "CRCW12061K00FKEA" 1206 2750,6504 r90 top
R11 "CRCW12061K00FKEA" 1206 2860,6502.63 r90 top
R12 "CRCW12061K00FKEA" 1206 2972.87,6502.81 r90 top
R13 "CRCW06031K00JNEA" 0603#1 735,5600 r0 top
R14 "CRCW06031K00JNEA" 0603#1 735,5450 r0 top
R15 "CRCW06031K00JNEA" 0603#1 735,5300 r0 top
R16 "CRCW06031K00JNEA" 0603#1 735,5150 r0 top
R17 "CRCW06031K00JNEA" 0603#1 735,5000 r0 top
R18 "CRCW06031K00JNEA" 0603#1 735,4850 r0 top
R19 "CRCW12060000Z0EA" 1206 348,4779 r90 top
R20 "CRCW06030000Z0EA" 0603#1 200,4555 r90 top
R21 "RG1608P-102-B-T5" 0603#1 2420,4780 r90 top
R22 "RG1608P-102-B-T5" 0603#1 2510,4780 r90 top
R23 "RG1608P-102-B-T5" 0603#1 2597,4780 r90 top
R24 "RG1608P-102-B-T5" 0603#1 2330,4780 r90 top
R25 "RG1608P-102-B-T5" 0603#1 2300,4330 r90 top
R26 "RG1608P-102-B-T5" 0603#1 2440,4330 r90 top
R27 "RG1608P-102-B-T5" 0603#1 2525,4330 r90 top
R28 "RG1608P-102-B-T5" 0603#1 2615,4330 r90 top
R29 "CRCW12060000Z0EA" 1206 2030,4535 r90 top
R30 "CRCW06031K00JNEA" 0603#1 735,3855 r0 top
R31 "CRCW06031K00JNEA" 0603#1 735,3705 r0 top
R32 "CRCW06031K00JNEA" 0603#1 735,3555 r0 top
R33 "CRCW06031K00JNEA" 0603#1 735,3405 r0 top
R34 "CRCW06031K00JNEA" 0603#1 735,3255 r0 top
R35 "CRCW06031K00JNEA" 0603#1 735,3105 r0 top
R36 "CRCW12060000Z0EA" 1206 323.01,3031.18 r90 top
R37 "CRCW06030000Z0EA" 0603#1 205,2280 r90 top
R38 "RG1608P-102-B-T5" 0603#1 2260,2520 r90 top
R39 "RG1608P-102-B-T5" 0603#1 2350,2520 r90 top
R40 "RG1608P-102-B-T5" 0603#1 2440,2520 r90 top
R41 "RG1608P-102-B-T5" 0603#1 2528,2520 r90 top
R42 "RG1608P-102-B-T5" 0603#1 2270,2140 r90 top
R43 "RG1608P-102-B-T5" 0603#1 2400,2140 r90 top
R44 "RG1608P-102-B-T5" 0603#1 2475,2140 r90 top
R45 "RG1608P-102-B-T5" 0603#1 2550,2140 r90 top
R46 "CRCW12060000Z0EA" 1206 1985,2275 r90 top
R47 "CRCW06031K00JNEA" 0603#1 735,1740 r0 top
R48 "CRCW06031K00JNEA" 0603#1 735,1590 r0 top
R49 "CRCW06031K00JNEA" 0603#1 735,1440 r0 top
R50 "CRCW06031K00JNEA" 0603#1 735,1290 r0 top
R51 "CRCW06031K00JNEA" 0603#1 735,1140 r0 top
R52 "CRCW06031K00JNEA" 0603#1 735,990 r0 top
R53 "CRCW12060000Z0EA" 1206 329.46,941.2 r90 top
R54 "CRCW12061K00FKEA" 1206 1943,474.49 r90 top
R55 "CRCW12061K00FKEA" 1206 2053,474.49 r90 top
R56 "CRCW12061K00FKEA" 1206 2163,474.49 r90 top
R57 "CRCW06030000Z0EA" 0603#1 2255,440 r90 top
R58 "CRCW06030000Z0EA" 0603#1 2330,440 r90 top
R59 "CRCW06030000Z0EA" 0603#1 2405,440 r90 top
R60 "CRCW06030000Z0EA" 0603#1 2480,440 r90 top
R61 "CRCW06030000Z0EA" 0603#1 2555,440 r90 top
R62 "CRCW06030000Z0EA" 0603#1 2630,440 r90 top
R63 "CRCW06030000Z0EA" 0603#1 2705,440 r90 top
R64 "CRCW06030000Z0EA" 0603#1 2780,440 r90 top
R65 "CRCW12061K00FKEA" 1206 2879,474.49 r90 top
R66 "CRCW251247R0JNEG" 2512 1120,2075 r180 top
R67 "RG1608P-102-B-T5" 0603#1 1720.02,2056.75 r180 top
R68 "CRCW08050000Z0EA" 0805_HV 1930,1790 r270 top
R69 "RG1608P-102-B-T5" 0603#1 1570,2000 r180 top
R70 "ERJ-3EKF1002V" 0603#1 2950,975 r180 top
R71 "CRCW06031M00JNEA" 0603#1 1436,1953 r90 top
R72 "RG1608P-102-B-T5" 0603#1 1570,1925 r180 top
R73 "RG1608P-102-B-T5" 0603#1 3340,1062 r270 top
R74 "CRCW251247R0JNEG" 2512 1120,1700 r180 top
R75 "ERJ-3EKF1002V" 0603#1 3225,940 r180 top
R76 "RG1608P-102-B-T5" 0603#1 1570,1625 r180 top
R77 "CRCW06031K60JNEA" 0603#1 2885,680 r180 top
R78 "CRCW06031M00JNEA" 0603#1 1436,1582 r90 top
R79 "RG1608P-102-B-T5" 0603#1 1570,1550 r180 top
R80 "ERJ-3EKF1002V" 0603#1 3195,1062 r270 top
R81 "CRCW251247R0JNEG" 2512 1120,1350 r180 top
R82 "ERJ-3EKF1002V" 0603#1 3270,1062 r270 top
R83 "ERJ-3EKF1002V" 0603#1 3190,2055 r90 top
R84 "CRCW06031K47FKEA" 0603#1 2315,725 r270 top
R85 "CRCW06031K47FKEA" 0603#1 2210,1850 r90 top
R86 "CRCW0603100KFKEA" 0603#1 2835,800 r270 top
R87 "RG1608P-102-B-T5" 0603#1 1570,1275 r180 top
R88 "CRCW0603100RJNEA" 0603#1 2926,800 r270 top
R89 "CRCW06031K82FKEA" 0603#1 2276,880 r270 top
R90 "CRCW06031M00JNEA" 0603#1 1435,1234 r90 top
R91 "CRCW06031K82FKEA" 0603#1 2260,1690 r90 top
R92 "RG1608P-102-B-T5" 0603#1 1570,1200 r180 top
R93 "CRCW251247R0JNEG" 2512 1120,1000 r180 top
R94 "CRCW06030000Z0EA" 0603#1 2770,970 r180 top
R95 "RG1608P-102-B-T5" 0603#1 1570,925 r180 top
R96 "CRCW06030000Z0EA" 0603#1 2770,1050 r0 top
R97 "CRCW06031M00JNEA" 0603#1 1434,882 r90 top
R98 "RG1608P-102-B-T5" 0603#1 1570,850 r180 top
R99 "CRCW06030000Z0EA" 0603#1 2940,1675 r90 top
R100 "CRCW251247R0JNEG" 2512 1120,650 r180 top
R101 "CRCW06030000Z0EA" 0603#1 2815,1630 r0 top
R102 "RG1608P-102-B-T5" 0603#1 1570,575 r180 top
R103 "CRCW06030000Z0EA" 0603#1 2720,1920 r180 top
R104 "CRCW06030000Z0EA" 0603#1 2720,2000 r180 top
R105 "CRCW06030000Z0EA" 0603#1 2720,2080 r180 top
R106 "CRCW06030000Z0EA" 0603#1 3015,1675 r90 top
R107 "CRCW06031M00JNEA" 0603#1 1434,532 r90 top
R108 "CRCW06030000Z0EA" 0603#1 2815,1555 r0 top
R109 "RG1608P-102-B-T5" 0603#1 1570,500 r180 top
R110 "CRCW251247R0JNEG" 2512 1120,300 r180 top
R111 "RG1608P-102-B-T5" 0603#1 1570,200 r180 top
R112 "CRCW06031M00JNEA" 0603#1 1435,161 r90 top
R113 "CRCW251247R0JNEG" 2512 1120,4390 r180 top
R114 "RG1608P-102-B-T5" 0603#1 1700,4330 r180 top
R115 "CRCW08050000Z0EA" 0805_HV 1927,3950 r270 top
R116 "RG1608P-102-B-T5" 0603#1 1570,4275 r180 top
R117 "CRCW06031M00JNEA" 0603#1 1435,4250 r90 top
R118 "RG1608P-102-B-T5" 0603#1 1570,4200 r180 top
R119 "CRCW251247R0JNEG" 2512 1120,4040 r180 top
R120 "RG1608P-102-B-T5" 0603#1 1570,3950 r180 top
R121 "CRCW06031M00JNEA" 0603#1 1435,3900 r90 top
R122 "RG1608P-102-B-T5" 0603#1 1570,3875 r180 top
R123 "CRCW06031K60JNEA" 0603#1 2885,2840 r180 top
R124 "CRCW251247R0JNEG" 2512 1122,3689 r180 top
R125 "RG1608P-102-B-T5" 0603#1 1565,3575 r180 top
R126 "CRCW0603100KFKEA" 0603#1 2835,2960 r270 top
R127 "CRCW06031K47FKEA" 0603#1 2240,2860 r270 top
R128 "CRCW06031K47FKEA" 0603#1 2285,4030 r90 top
R129 "CRCW06031M00JNEA" 0603#1 1435,3558 r90 top
R130 "CRCW0603100RJNEA" 0603#1 2915,2960 r90 top
R131 "RG1608P-102-B-T5" 0603#1 1565,3500 r180 top
R132 "CRCW06031K82FKEA" 0603#1 2280,3020 r270 top
R133 "CRCW251247R0JNEG" 2512 1120,3340 r180 top
R134 "CRCW06031K82FKEA" 0603#1 2260,3870 r90 top
R135 "CRCW0603100KFKEA" 0603#1 2750,3370 r0 top
R136 "RG1608P-102-B-T5" 0603#1 1570,3250 r180 top
R137 "CRCW06031M00JNEA" 0603#1 1436,3213 r90 top
R138 "RG1608P-102-B-T5" 0603#1 1570,3175 r180 top
R139 "CRCW251247R0JNEG" 2512 1120,2990 r180 top
R140 "CRCW06030000Z0EA" 0603#1 3035,3835 r90 top
R141 "CRCW06030000Z0EA" 0603#1 2830,3865 r0 top
R142 "RG1608P-102-B-T5" 0603#1 1570,2875 r180 top
R143 "CRCW06031M00JNEA" 0603#1 1435,2833 r90 top
R144 "CRCW06030000Z0EA" 0603#1 3110,3835 r90 top
R145 "RG1608P-102-B-T5" 0603#1 1570,2800 r180 top
R146 "CRCW06030000Z0EA" 0603#1 2830,3715 r0 top
R147 "CRCW251247R0JNEG" 2512 1120,2640 r180 top
R148 "RG1608P-102-B-T5" 0603#1 1570,2475 r180 top
R149 "CRCW06031M00JNEA" 0603#1 1435,2428 r90 top
R150 "CRCW251247R0JNEG" 2512 1120,6650 r180 top
R151 "RG1608P-102-B-T5" 0603#1 1725,6605 r180 top
R152 "CRCW08050000Z0EA" 0805_HV 1927,6190 r270 top
R153 "RG1608P-102-B-T5" 0603#1 1565,6555 r180 top
R154 "CRCW06031M00JNEA" 0603#1 1435,6520 r90 top
R155 "RG1608P-102-B-T5" 0603#1 1565,6485 r180 top
R156 "CRCW251247R0JNEG" 2512 1120,6300 r180 top
R157 "RG1608P-102-B-T5" 0603#1 1565,6200 r180 top
R158 "CRCW06031M00JNEA" 0603#1 1435,6165 r90 top
R159 "RG1608P-102-B-T5" 0603#1 1565,6130 r180 top
R160 "CRCW251247R0JNEG" 2512 1120,5950 r180 top
R161 "CRCW06031K60JNEA" 0603#1 2885,5120 r180 top
R162 "RG1608P-102-B-T5" 0603#1 1565,5855 r180 top
R163 "CRCW06031M00JNEA" 0603#1 1435,5820 r90 top
R164 "RG1608P-102-B-T5" 0603#1 1565,5785 r180 top
R165 "CRCW06031K47FKEA" 0603#1 2209,5130 r270 top
R166 "CRCW06031K47FKEA" 0603#1 2300,6260 r90 top
R167 "CRCW251247R0JNEG" 2512 1120,5600 r180 top
R168 "CRCW0603100KFKEA" 0603#1 2835,5240 r270 top
R169 "CRCW06031K82FKEA" 0603#1 2260,5305 r270 top
R170 "CRCW06031K82FKEA" 0603#1 2265,6100 r90 top
R171 "CRCW0603100RJNEA" 0603#1 2915,5240 r90 top
R172 "CRCW0603100KFKEA" 0603#1 2750,5620 r0 top
R173 "RG1608P-102-B-T5" 0603#1 1565,5505 r180 top
R174 "CRCW06031M00JNEA" 0603#1 1435,5470 r90 top
R175 "RG1608P-102-B-T5" 0603#1 1565,5435 r180 top
R176 "CRCW251247R0JNEG" 2512 1120,5250 r180 top
R177 "CRCW06030000Z0EA" 0603#1 2700,4955 r180 top
R178 "RG1608P-102-B-T5" 0603#1 1565,5155 r180 top
R179 "CRCW06030000Z0EA" 0603#1 3045,6100 r90 top
R180 "CRCW06031M00JNEA" 0603#1 1435,5120 r90 top
R181 "CRCW06030000Z0EA" 0603#1 2830,6050 r0 top
R182 "RG1608P-102-B-T5" 0603#1 1565,5085 r180 top
R183 "CRCW251247R0JNEG" 2512 1120,4900 r180 top
R184 "CRCW06030000Z0EA" 0603#1 3135,6100 r90 top
R185 "CRCW06030000Z0EA" 0603#1 2830,5970 r0 top
R186 "RG1608P-102-B-T5" 0603#1 1570,4810 r180 top
R187 "CRCW06031M00JNEA" 0603#1 1435,4775 r90 top
R188 "CRCW0603100RJNEA" 0603#1 3725,2300 r0 top
R189 "CRCW0603100RJNEA" 0603#1 3725,2225 r0 top
R190 "CRCW06031M00JNEA" 0603#1 4450,2474 r90 top
R191 "CRCW06031M00JNEA" 0603#1 4650,2475 r90 top
R192 "CRCW06031M00JNEA" 0603#1 4550,2475 r90 top
R193 "CRCW0603100RJNEA" 0603#1 3725,2150 r0 top
R194 "CRCW0603100RJNEA" 0603#1 3725,2075 r0 top
R195 "CRCW06031M00JNEA" 0603#1 4550,1925 r270 top
R196 "ERJ-3EKF1002V" 0603#1 3550,2000 r0 top
R197 "CRCW0603100RJNEA" 0603#1 3600,1675 r180 top
R198 "CRCW06030000Z0EA" 0603#1 4475,1625 r0 top
R199 "CRCW06030000Z0EA" 0603#1 4475,1700 r0 top
R200 "CRCW06030000Z0EA" 0603#1 4475,1775 r0 top
R201 "CRCW0603100RJNEA" 0603#1 3600,1750 r180 top
R202 "RG1608P-102-B-T5" 0603#1 3550,2250 r0 top
R203 "CRCW0603100RJNEA" 0603#1 3600,1825 r180 top
R204 "CRCW0603100KFKEA" 0603#1 4450,1925 r90 top
R205 "CRCW0603100RJNEA" 0603#1 4325,1825 r180 top
R206 "CRCW0603100RJNEA" 0603#1 3600,1900 r180 top
R207 "ERJ-3EKF1002V" 0603#1 4550,1375 r0 top
R208 "ERJ-3EKF1002V" 0603#1 4551,1450 r0 top
R209 "ERJ-3EKF1002V" 0603#1 4550,1526 r0 top
R210 "RC0603FR-072RL" 0603#1 4600,500 r270 top
R211 "ERJ-3EKF1002V" 0603#1 4100,1000 r270 top
R212 "RC0603FR-07523KL" 0603#1 3650,1175 r0 top
R213 "RC0603FR-07169KL" 0603#1 3775,1050 r90 top
R214 "RG1608P-102-B-T5" 0603#1 4350,775 r0 top
R215 "CRCW06031R00JNEA" 0603#1 4500,700 r90 top
RT1 "ERT-J1VG103FA" 0603#1 4550,4420 r90 top
RT2 "ERT-J1VG103FA" 0603#1 4200,4420 r90 top
RT3 "ERT-J1VG103FA" 0603#1 4550,5330 r90 top
RT4 "ERT-J1VG103FA" 0603#1 4175,5330 r90 top
RT5 "ERT-J1VG103FA" 0603#1 4525,6250 r90 top
RT6 "ERT-J1VG103FA" 0603#1 4200,6250 r90 top
SH-J1 "969102-0000-DA" SNT-100-BK-G 504,5598 r180 top
SH-J2 "969102-0000-DA" SNT-100-BK-G 515,5455 r180 top
SH-J3 "969102-0000-DA" SNT-100-BK-G 480,5280 r180 top
SH-J4 "969102-0000-DA" SNT-100-BK-G 504,5148 r180 top
SH-J5 "969102-0000-DA" SNT-100-BK-G 504,4998 r180 top
SH-J6 "969102-0000-DA" SNT-100-BK-G 500.88,4833.77 r180 top
SH-J7 "969102-0000-DA" SNT-100-BK-G 504,3854 r180 top
SH-J8 "969102-0000-DA" SNT-100-BK-G 515,3705 r180 top
SH-JP1 "969102-0000-DA" SNT-100-BK-G 4295,6265 r90 top
SH-JP2 "969102-0000-DA" SNT-100-BK-G 515,1935 r180 top
SH-JP3 "969102-0000-DA" SNT-100-BK-G 4445,6235 r90 top
SH-JP4 "969102-0000-DA" SNT-100-BK-G 4455,4405 r90 top
SH-JP5 "969102-0000-DA" SNT-100-BK-G 4300,5320 r90 top
SH-JP6 "969102-0000-DA" SNT-100-BK-G 4295,4410 r90 top
SH-JP7 "969102-0000-DA" SNT-100-BK-G 515,5855 r180 top
SH-JP8 "969102-0000-DA" SNT-100-BK-G 525,4075 r180 top
SH-JP9 "969102-0000-DA" SNT-100-BK-G 4425,5320 r90 top
SH-JP10 "969102-0000-DA" SNT-100-BK-G 504,3404 r180 top
SH-JP11 "969102-0000-DA" SNT-100-BK-G 504,3254 r180 top
SH-JP12 "969102-0000-DA" SNT-100-BK-G 504,3104 r180 top
SH-JP13 "969102-0000-DA" SNT-100-BK-G 504,1740 r180 top
SH-JP14 "969102-0000-DA" SNT-100-BK-G 515,1595 r180 top
SH-JP15 "969102-0000-DA" SNT-100-BK-G 504,1440 r180 top
SH-JP16 "969102-0000-DA" SNT-100-BK-G 505,1300 r180 top
SH-JP17 "969102-0000-DA" SNT-100-BK-G 504,1140 r180 top
SH-JP18 "969102-0000-DA" SNT-100-BK-G 500,985 r180 top
SH-JP19 "969102-0000-DA" SNT-100-BK-G 504,3554 r180 top
T1 "Q4470-CLB" Coilcraft_Q4470-CL 4059,501 r180 top
TP1 "5015" Testpoint_Keystone_Miniature 525,6000 r0 top
TP2 "5015" Testpoint_Keystone_Miniature 525,4680 r0 top
TP3 "5015" Testpoint_Keystone_Miniature 525,4235 r0 top
TP4 "5015" Testpoint_Keystone_Miniature 525,2875 r0 top
TP5 "5015" Testpoint_Keystone_Miniature 525,2075 r0 top
TP6 "5015" Testpoint_Keystone_Miniature 525,790 r0 top
TP-1 "5015" Testpoint_Keystone_Miniature 2100,1880 r0 top
TP-2 "5015" Testpoint_Keystone_Miniature 1910,710 r0 top
TP-3 "5015" Testpoint_Keystone_Miniature 2077,710 r0 top
TP-4 "5015" Testpoint_Keystone_Miniature 2100,2020 r0 top
TP-5 "5015" Testpoint_Keystone_Miniature 2935,2140 r0 top
TP-6 "5015" Testpoint_Keystone_Miniature 2937.44,2002.02 r0 top
TP-7 "5015" Testpoint_Keystone_Miniature 2040,4115 r0 top
TP-8 "5015" Testpoint_Keystone_Miniature 2070,2765 r0 top
TP-9 "5015" Testpoint_Keystone_Miniature 2070,2905 r0 top
TP-10 "5015" Testpoint_Keystone_Miniature 2040,4260 r0 top
TP-11 "5015" Testpoint_Keystone_Miniature 3005,4010 r0 top
TP-12 "5015" Testpoint_Keystone_Miniature 3178,4010 r0 top
TP-13 "5015" Testpoint_Keystone_Miniature 1930.75,6355 r0 top
TP-14 "5015" Testpoint_Keystone_Miniature 1975,4925 r0 top
TP-15 "5015" Testpoint_Keystone_Miniature 1975,5075 r0 top
TP-16 "5015" Testpoint_Keystone_Miniature 2100,6355 r0 top
TP-17 "5015" Testpoint_Keystone_Miniature 3015,6280 r0 top
TP-18 "5015" Testpoint_Keystone_Miniature 3185,6280 r0 top
TP-19 "5015" Testpoint_Keystone_Miniature 4550,2710 r0 top
TP-20 "5020" Testpoint_Keystone_Miniature 3725,1380 r0 top
TP-AGN "5015" Testpoint_Keystone_Miniature 4425,150 r0 top
TP-C1 "5015" Testpoint_Keystone_Miniature 1640,2165 r0 top
TP-C2 "5015" Testpoint_Keystone_Miniature 1815,2165 r0 top
TP-C3 "5015" Testpoint_Keystone_Miniature 1640,4435 r0 top
TP-C4 "5015" Testpoint_Keystone_Miniature 1810,4435 r0 top
TP-C5 "5015" Testpoint_Keystone_Miniature 1620,6755 r0 top
TP-C6 "5015" Testpoint_Keystone_Miniature 1790,6755 r0 top
TP-SW1 "5015" Testpoint_Keystone_Miniature 4825,640 r0 top
TP-VPROG1 "5015" Testpoint_Keystone_Miniature 2960,1460 r90 top
TP-VPROG2 "5015" Testpoint_Keystone_Miniature 3050,3450 r0 top
TP-VPROG3 "5015" Testpoint_Keystone_Miniature 3050,5700 r0 top
TP-VSS1 "5015" Testpoint_Keystone_Miniature 3280,760 r0 top
TP-VSS2 "5015" Testpoint_Keystone_Miniature 3050,5560 r0 top
TP-VSS3 "5015" Testpoint_Keystone_Miniature 3595,130 r0 top
TPTP-VSS1 "5015" Testpoint_Keystone_Miniature 3050,3305 r180 top
U1 "BQ76PL536APAPR" PAP0064F_N 2350,1280 r0 top locked
U2 "BQ76PL536APAPR" PAP0064F_N 2350,3450 r0 top locked
U3 "BQ76PL536APAPR" PAP0064F_N 2350,5700 r0 top locked
U4 "ISO7241CDW" DW0016A_N 4125,2225 r0 top locked
U5 "PCA9557PWR" PW0016A_N 4550,2200 r270 top locked
U6 "ISO7241CDW" DW0016A_N 3975,1750 r180 top locked
U7 "TPS76933DBVR" DBV0005A_N 4325,1300 r90 top
U8 "UCC2808DTR-2" D0008A_N 4350,950 r0 top
U9 "TPS76901DBV" DBV0005A_N 3650,1050 r90 top
Z1 "SMAJ36CA" SMA 1820,1820 r270 top
Z2 "MMSZ5232B-7-F" SOD-123 1131,1913 r180 top
Z3 "MMSZ5232B-7-F" SOD-123 1343,1950 r270 top
Z4 "MMSZ5232B-7-F" SOD-123 1131,1542 r180 top
Z5 "MMSZ5232B-7-F" SOD-123 1343,1600 r270 top
Z6 "MMSZ5232B-7-F" SOD-123 1131,1185 r180 top
Z7 "MMSZ5232B-7-F" SOD-123 1343,1250 r270 top
Z8 "MMSZ5232B-7-F" SOD-123 1131,830 r180 top
Z9 "MMSZ5232B-7-F" SOD-123 1343,900 r270 top
Z10 "MMSZ5232B-7-F" SOD-123 1131,479 r180 top
Z11 "MMSZ5232B-7-F" SOD-123 1343,550 r270 top
Z12 "MMSZ5232B-7-F" SOD-123 1131,128 r180 top
Z13 "MMSZ5232B-7-F" SOD-123 1343,200 r270 top
Z14 "MMSZ5232B-7-F" SOD-123 1131,4236 r180 top
Z15 "SMAJ36CA" SMA 1825,3975 r270 top
Z16 "MMSZ5232B-7-F" SOD-123 1343,4260 r270 top
Z17 "MMSZ5232B-7-F" SOD-123 1131,3887 r180 top
Z18 "MMSZ5232B-7-F" SOD-123 1343,3925 r270 top
Z19 "MMSZ5232B-7-F" SOD-123 1131,3540 r180 top
Z20 "MMSZ5232B-7-F" SOD-123 1343,3600 r270 top
Z21 "MMSZ5232B-7-F" SOD-123 1131,3191 r180 top
Z22 "MMSZ5232B-7-F" SOD-123 1343,3250 r270 top
Z23 "MMSZ5232B-7-F" SOD-123 1131,2828 r180 top
Z24 "MMSZ5232B-7-F" SOD-123 1343,2850 r270 top
Z25 "MMSZ5232B-7-F" SOD-123 1131,2470 r180 top
Z26 "MMSZ5232B-7-F" SOD-123 1343,2450 r270 top
Z27 "SMAJ36CA" SMA 2060,6140 r270 top
Z28 "MMSZ5232B-7-F" SOD-123 1131,6485 r180 top
Z29 "MMSZ5232B-7-F" SOD-123 1343,6520 r270 top
Z30 "MMSZ5232B-7-F" SOD-123 1131,6135 r180 top
Z31 "MMSZ5232B-7-F" SOD-123 1343,6170 r270 top
Z32 "MMSZ5232B-7-F" SOD-123 1131,5790 r180 top
Z33 "MMSZ5232B-7-F" SOD-123 1343,5820 r270 top
Z34 "MMSZ5232B-7-F" SOD-123 1131,5442 r180 top
Z35 "MMSZ5232B-7-F" SOD-123 1343,5470 r270 top
Z36 "MMSZ5232B-7-F" SOD-123 1131,5089 r180 top
Z37 "MMSZ5232B-7-F" SOD-123 1343,5120 r270 top
Z38 "MMSZ5232B-7-F" SOD-123 1131,4734 r180 top
Z39 "MMSZ5232B-7-F" SOD-123 1343,4770 r270 top
ZZ1 "This Assembly Note is for PCB labels only" AssemblyNoteLabel 150,7739 r0 top
ZZ2 "These assemblies are ESD sensitive, ESD precautions shall be observed." AssemblyNote 150,7630.11 r0 top
ZZ3 "These assemblies must be clean and free from flux and all contaminants. Use of no clean flux is not acceptable." AssemblyNote 150,7541.56 r0 top
ZZ4 "These assemblies must comply with workmanship standards IPC-A-610 Class 2, unless otherwise specified." AssemblyNote 150,7453 r0 top
ZZ5 "Please place P9- Terminal; P10- Terminal; P11- Terminal; to P1; P2; P3" AssemblyNote 145,7320 r0 top

## Footprints (in the part's own frame and the unit in brackets; to place one, negate y for a bottom-side part, rotate by r counter-clockwise, add the part's x,y. Pads: shape width x height; smd on the part's side, far side on the other; paste and mask are expansions set on the pad)
0603#1 [mm] "0603 from SM-752 data"
  rect 1x0.95 smd: 1(-0.8,0) 2(0.8,0)
  silkscreen extent -1.52,-0.69 1.52,0.69, body extent -0.87,-0.47 0.87,0.47, height 0.85
0603#2 [mm] "0603 from SM-752 data"
  rect 1x0.95 smd: 1(-2.832,4.877) 2(-1.232,4.877)
  silkscreen extent -3.56,4.19 -0.51,5.57, body extent -2.91,4.4 -1.16,5.35, height 0.85
0805_145 [mm] "0805 / 1.45mm height"
  rect 1.15x1.45 smd: 1(-0.9,0) 2(0.9,0)
  silkscreen extent -0.1,-0.8 0.1,0.8, body extent -1.1,-0.72 1.1,0.72, height 1.45
0805_HV [mil] "0805 with 30mil clearance between pads"
  rect 50x63 smd: 1(-40,0) 2(40,0)
  silkscreen extent -74,-40 74,40, body extent -43,-29 43,29, height 57
1206 [mm] "1206 from SM-752 data"
  rect 1.3x1.85 smd: 1(-1.45,0) 2(1.45,0)
  silkscreen extent -2.4,-1.21 2.4,1.21, body extent -1.7,-0.9 1.7,0.9, height 1.35
2512 [mm] "Chip Resistor, Body 6.3x3.2mm, IPC Medium Density"
  rect 1.3x3.4 smd: 1(-2.95,0) 2(2.95,0)
  silkscreen extent -1.9,-1.6 1.9,1.6, body extent -3.22,-1.67 3.22,1.67, height 0.71
APT1608_Yellow [mm] "SMD, 2-Leads, Body 0.8x1.6mm"
  rect 0.8x0.8 smd: 1(-0.825,0) 2(0.825,0)
  silkscreen extent -1,-0.7 1.8,0.7, body extent -0.8,-0.4 0.81,0.4, height 0.76
AssemblyNote [mil] "Assembly Note"
AssemblyNoteLabel [mil] "Assembly Note for PCB Labels"
CAPRD750W60D700H1000 [mm] "muRata"
  round 1.35 hole 0.85: 1(-3.75,3) 2(3.75,-3)
  silkscreen extent -3.5,-2.95 3.47,3.05, body extent -4.26,-3.51 4.26,3.51, height 9.97
Coilcraft_Q4470-CL [mm] "SMD, 6-Leads, Body 6.6x6.99mm, Pitch 2.54mm"
  rect 1.27x1.27 smd: 1(-4.13,2.54) 2(-4.13,0) 3(-4.13,-2.54) 4(4.13,-2.54) 5(4.13,0) 6(4.13,2.54)
  silkscreen extent -3.4,-3.5 3.3,3.8, body extent -4.25,-3.49 4.25,3.5, height 5.46
CONN_5103308-1 [mm] "TE Connectivity (AMP) Rev E datasheet"
  rect 1.65x1.65 hole 1.016 mask+0: 1(-5.08,-1.27)
  round 1.65 hole 1.016 mask+0: 2(-5.08,1.27) 3(-2.54,-1.27) 4(-2.54,1.27) 5(0,-1.27) 6(0,1.27) 7(2.54,-1.27) 8(2.54,1.27) 9(5.08,-1.27) 10(5.08,1.27)
  silkscreen extent -10.16,-4.57 10.16,4.57, body extent -10.16,-4.57 10.16,4.57, height 9.87
CONN_PEC02SAAN [mm] "SULLINS"
  rect 1.5x1.5 hole 1.016: 1(-1.27,0)
  round 1.5 hole 1.016: 2(1.27,0)
  silkscreen extent -3.45,-1.27 2.54,1.27, body extent -2.54,-1.27 2.54,1.27, height 8.38
CONN_PEC03SAAN [mm] "SULLINS"
  rect 1.5x1.5 hole 1.016: 1(-2.54,0)
  round 1.5 hole 1.016: 2(0,0) 3(2.54,0)
  silkscreen extent -4.72,-1.27 3.81,1.27, body extent -3.84,-1.3 3.84,1.3, height 8.38
D0008A_N [mm] "SOIC, 8-Leads, Body 4.9x3.9mm, Pitch 1.27mm, IPC Medium Density"
  oval 1.45x0.6 smd: 1(-2.725,1.905) 2(-2.725,0.635) 3(-2.725,-0.635) 4(-2.725,-1.905) 5(2.725,-1.905) 6(2.725,-0.635) 7(2.725,0.635) 8(2.725,1.905)
  silkscreen extent -3.3,-2.5 0.9,2.5, body extent -3,-2.45 3,2.45, height 1.63
DBV0005A_N [mm] "SOT23, 5-Leads, Body 2.9x1.6mm, Pitch 0.95mm, Lead Span 2.8mm, IPC Medium Density"
  rrect17% 1x0.6 smd: 1(-1.375,0.95) 2(-1.375,0) 3(-1.375,-0.95) 4(1.375,-0.95) 5(1.375,0.95)
  silkscreen extent -1.63,-1.55 0.38,1.55, body extent -1.42,-1.46 1.42,1.46, height 1.09
DW0016A_N [mm] "SOIC, 16-Leads, Body 10.3x7.5mm, Pitch 1.27mm, IPC Medium Density"
  oval 1.9x0.6 smd: 1(-4.75,4.445) 2(-4.75,3.175) 3(-4.75,1.905) 4(-4.75,0.635) 5(-4.75,-0.635) 6(-4.75,-1.905) 7(-4.75,-3.175) 8(-4.75,-4.445) 9(4.75,-4.445) 10(4.75,-3.175) 11(4.75,-1.905) 12(4.75,-0.635) 13(4.75,0.635) 14(4.75,1.905) 15(4.75,3.175) 16(4.75,4.445)
  silkscreen extent -5.6,-5.25 3,5.25, body extent -5.14,-5.13 5.14,5.13, height 2.54
FCC_disclaimer [mil]
Fiducial10-20#1 [mm]
  round 1 smd mask+0.5: 1(0,0)
  Top Layer keep-out circle w1.178: c0,0 r0.5
Fiducial10-20#2 [mm]
  round 1 smd mask+0.5: 1(0,-0.076)
  Top Layer keep-out circle w1.178: c0,0 r0.5
Fiducial10-20#3 [mm]
  round 1 smd mask+0.5: 1(0.102,0)
  Top Layer keep-out circle w1.178: c0,0 r0.5
IEC_HighVoltage_Small [mil]
  silkscreen extent -107,-88 107,97
Keystone_9030 [mm] "BRD SPT SNAP LOCK SCREW MNT 3/8\""
  round 4.7 hole 4.7 unplated mask+0: ""(0,0)
  silkscreen extent -3.3,-3.3 3.3,3.3, body extent -3.3,-3.3 3.3,3.3, height 12.7
Label_650x200 [mil] "Thermal Transfer Label"
  round 1 on Mech13: 0(0,0)
  silkscreen extent -325,-100 325,100, body extent -326,-101 326,101, height 1
Molex_395021007 [mm] "Header(Shrouded), 3.5mm, 7x1,  R/A, TH"
  rect 1.8x1.8 hole 1.3: 1(-10.5,0)
  round 1.8 hole 1.3: 2(-7,0) 3(-3.5,0) 4(0,0) 5(3.5,0) 6(7,0) 7(10.5,0)
  silkscreen extent -12.95,-7.87 12.95,1.52, body extent -12.95,-7.87 12.95,1.27, height 6.86
PAP0064F_N [mm] "Thin QFP, 64-Leads, Body 10x10mm, Pitch 0.5mm, Thermal Pad 6.5x6.5mm, IPC Medium Density"
  rrect100% 1.45x0.3 smd: 1(-5.725,3.75) 2(-5.725,3.25) 3(-5.725,2.75) 4(-5.725,2.25) 5(-5.725,1.75) 6(-5.725,1.25) 7(-5.725,0.75) 8(-5.725,0.25) 9(-5.725,-0.25) 10(-5.725,-0.75) 11(-5.725,-1.25) 12(-5.725,-1.75) 13(-5.725,-2.25) 14(-5.725,-2.75) 15(-5.725,-3.25) 16(-5.725,-3.75) 33(5.725,-3.75) 34(5.725,-3.25) 35(5.725,-2.75) 36(5.725,-2.25) 37(5.725,-1.75) 38(5.725,-1.25) 39(5.725,-0.75) 40(5.725,-0.25) 41(5.725,0.25) 42(5.725,0.75) 43(5.725,1.25) 44(5.725,1.75) 45(5.725,2.25) 46(5.725,2.75) 47(5.725,3.25) 48(5.725,3.75)
  rrect100% 0.3x1.45 smd: 17(-3.75,-5.725) 18(-3.25,-5.725) 19(-2.75,-5.725) 20(-2.25,-5.725) 21(-1.75,-5.725) 22(-1.25,-5.725) 23(-0.75,-5.725) 24(-0.25,-5.725) 25(0.25,-5.725) 26(0.75,-5.725) 27(1.25,-5.725) 28(1.75,-5.725) 29(2.25,-5.725) 30(2.75,-5.725) 31(3.25,-5.725) 32(3.75,-5.725) 49(3.75,5.725) 50(3.25,5.725) 51(2.75,5.725) 52(2.25,5.725) 53(1.75,5.725) 54(1.25,5.725) 55(0.75,5.725) 56(0.25,5.725) 57(-0.25,5.725) 58(-0.75,5.725) 59(-1.25,5.725) 60(-1.75,5.725) 61(-2.25,5.725) 62(-2.75,5.725) 63(-3.25,5.725) 64(-3.75,5.725)
  rrect2% 6.5x6.5 smd: 65(0,0)
  silkscreen extent -5.67,-4.25 4.25,4.57, body extent -6.01,-6.01 6.01,6.01, height 1.2
Pb-Free_Overlay_Small [mil]
  silkscreen extent -46,-46 46,46
PW0016A_N [mm] "TSOP, 16-Leads, Body 5x4.4mm, Pitch 0.65mm, IPC Medium Density"
  oval 1.4x0.45 smd: 1(-2.95,2.275) 2(-2.95,1.625) 3(-2.95,0.975) 4(-2.95,0.325) 5(-2.95,-0.325) 6(-2.95,-0.975) 7(-2.95,-1.625) 8(-2.95,-2.275) 9(2.95,-2.275) 10(2.95,-1.625) 11(2.95,-0.975) 12(2.95,-0.325) 13(2.95,0.325) 14(2.95,0.975) 15(2.95,1.625) 16(2.95,2.275)
  silkscreen extent -3.5,-2.55 1.85,2.75, body extent -3.21,-2.5 3.21,2.5, height 1
Samtec_HPM-10-05-T-S [mm] "Header, 5.08mm, 10x1, TH"
  rect 2.25x2.25 hole 1.75: 1(-22.86,0)
  round 2.25 hole 1.75: 2(-17.78,0) 3(-12.7,0) 4(-7.62,0) 5(-2.54,0) 6(2.54,0) 7(7.62,0) 8(12.7,0) 9(17.78,0) 10(22.86,0)
  silkscreen extent -25.47,-3.17 25.33,3.8, body extent -25.47,-3.17 25.33,3.18, height 7.15
SMA [mm] "Molded Diode, 2-Leads, Body 4.3x2.6mm, IPC Medium Density, based on OnSemi component dimensions and land pattern"
  rect 2x2 smd: 1(-2,0) 2(2,0)
  silkscreen extent -3.66,-1.57 2.79,1.57, body extent -2.6,-1.3 2.6,1.3, height 2.42
SNT-100-BK-G [mil] "Samtec STEP model"
  round 1 on Mech3: 0(0,0)
  body extent -100,-50 100,50, height 344
SOD-123 [mm] "On Semi recommended land pattern"
  rect 0.915x1.22 smd: 1(-1.637,0) 2(1.637,0)
  silkscreen extent -2.74,-1.17 2.03,1.17, body extent -1.93,-0.9 1.93,0.9, height 1.35
sod-323 [mm] "NXP recommended land pattern"
  rect 0.6x0.6 smd paste-0.05: 1(-1.1,0) 2(1.1,0)
  silkscreen extent -2.06,-0.86 1.53,0.86, body extent -1.3,-0.67 1.3,0.68, height 1.1
Testpoint_Keystone_Miniature [mil] "Miniature SMT test point"
  rect 135x70 smd: 1(0,0)
  silkscreen extent -78,-46 78,45, body extent -52,-20 52,20, height 61
TI_Stacked_Overlay_Small [mil]
  silkscreen extent -418,-98 418,98
TRANS_NexFET_Q2 [mm] "TI recommended land pattern M0167-01"
  rrect33% 0.45x0.3 smd: 1(-0.975,0.65) 2(-0.975,0) 3(-0.975,-0.65) 4(0.975,-0.65) 5(0.975,0) 6(0.975,0.65)
  rrect33% 0.75x0.3 smd paste-0.025: 7(0.095,-0.65)
  rrect11% 1x0.95 smd paste-0.025: 8(0,0.325)
  silkscreen extent -1.15,-1.15 1.15,1.15, body extent -1,-1 1,1, height 0.85